# Altium PCB AirBnB-v1.0.PcbDoc (part 1 of 6)
Units mil, origin at the board's own origin, x right, y up, seen from the top; angles counter-clockwise.
Board outline 3937 x 3937 mil, 4 copper layers (Top Layer, Signal + GND, Signal + 3v3, Bottom Layer), stack 62.417 mil thick; 240 components, 168 nets, 829 pads, 395 vias.
Unrouted connection lines stored in the file: 6.
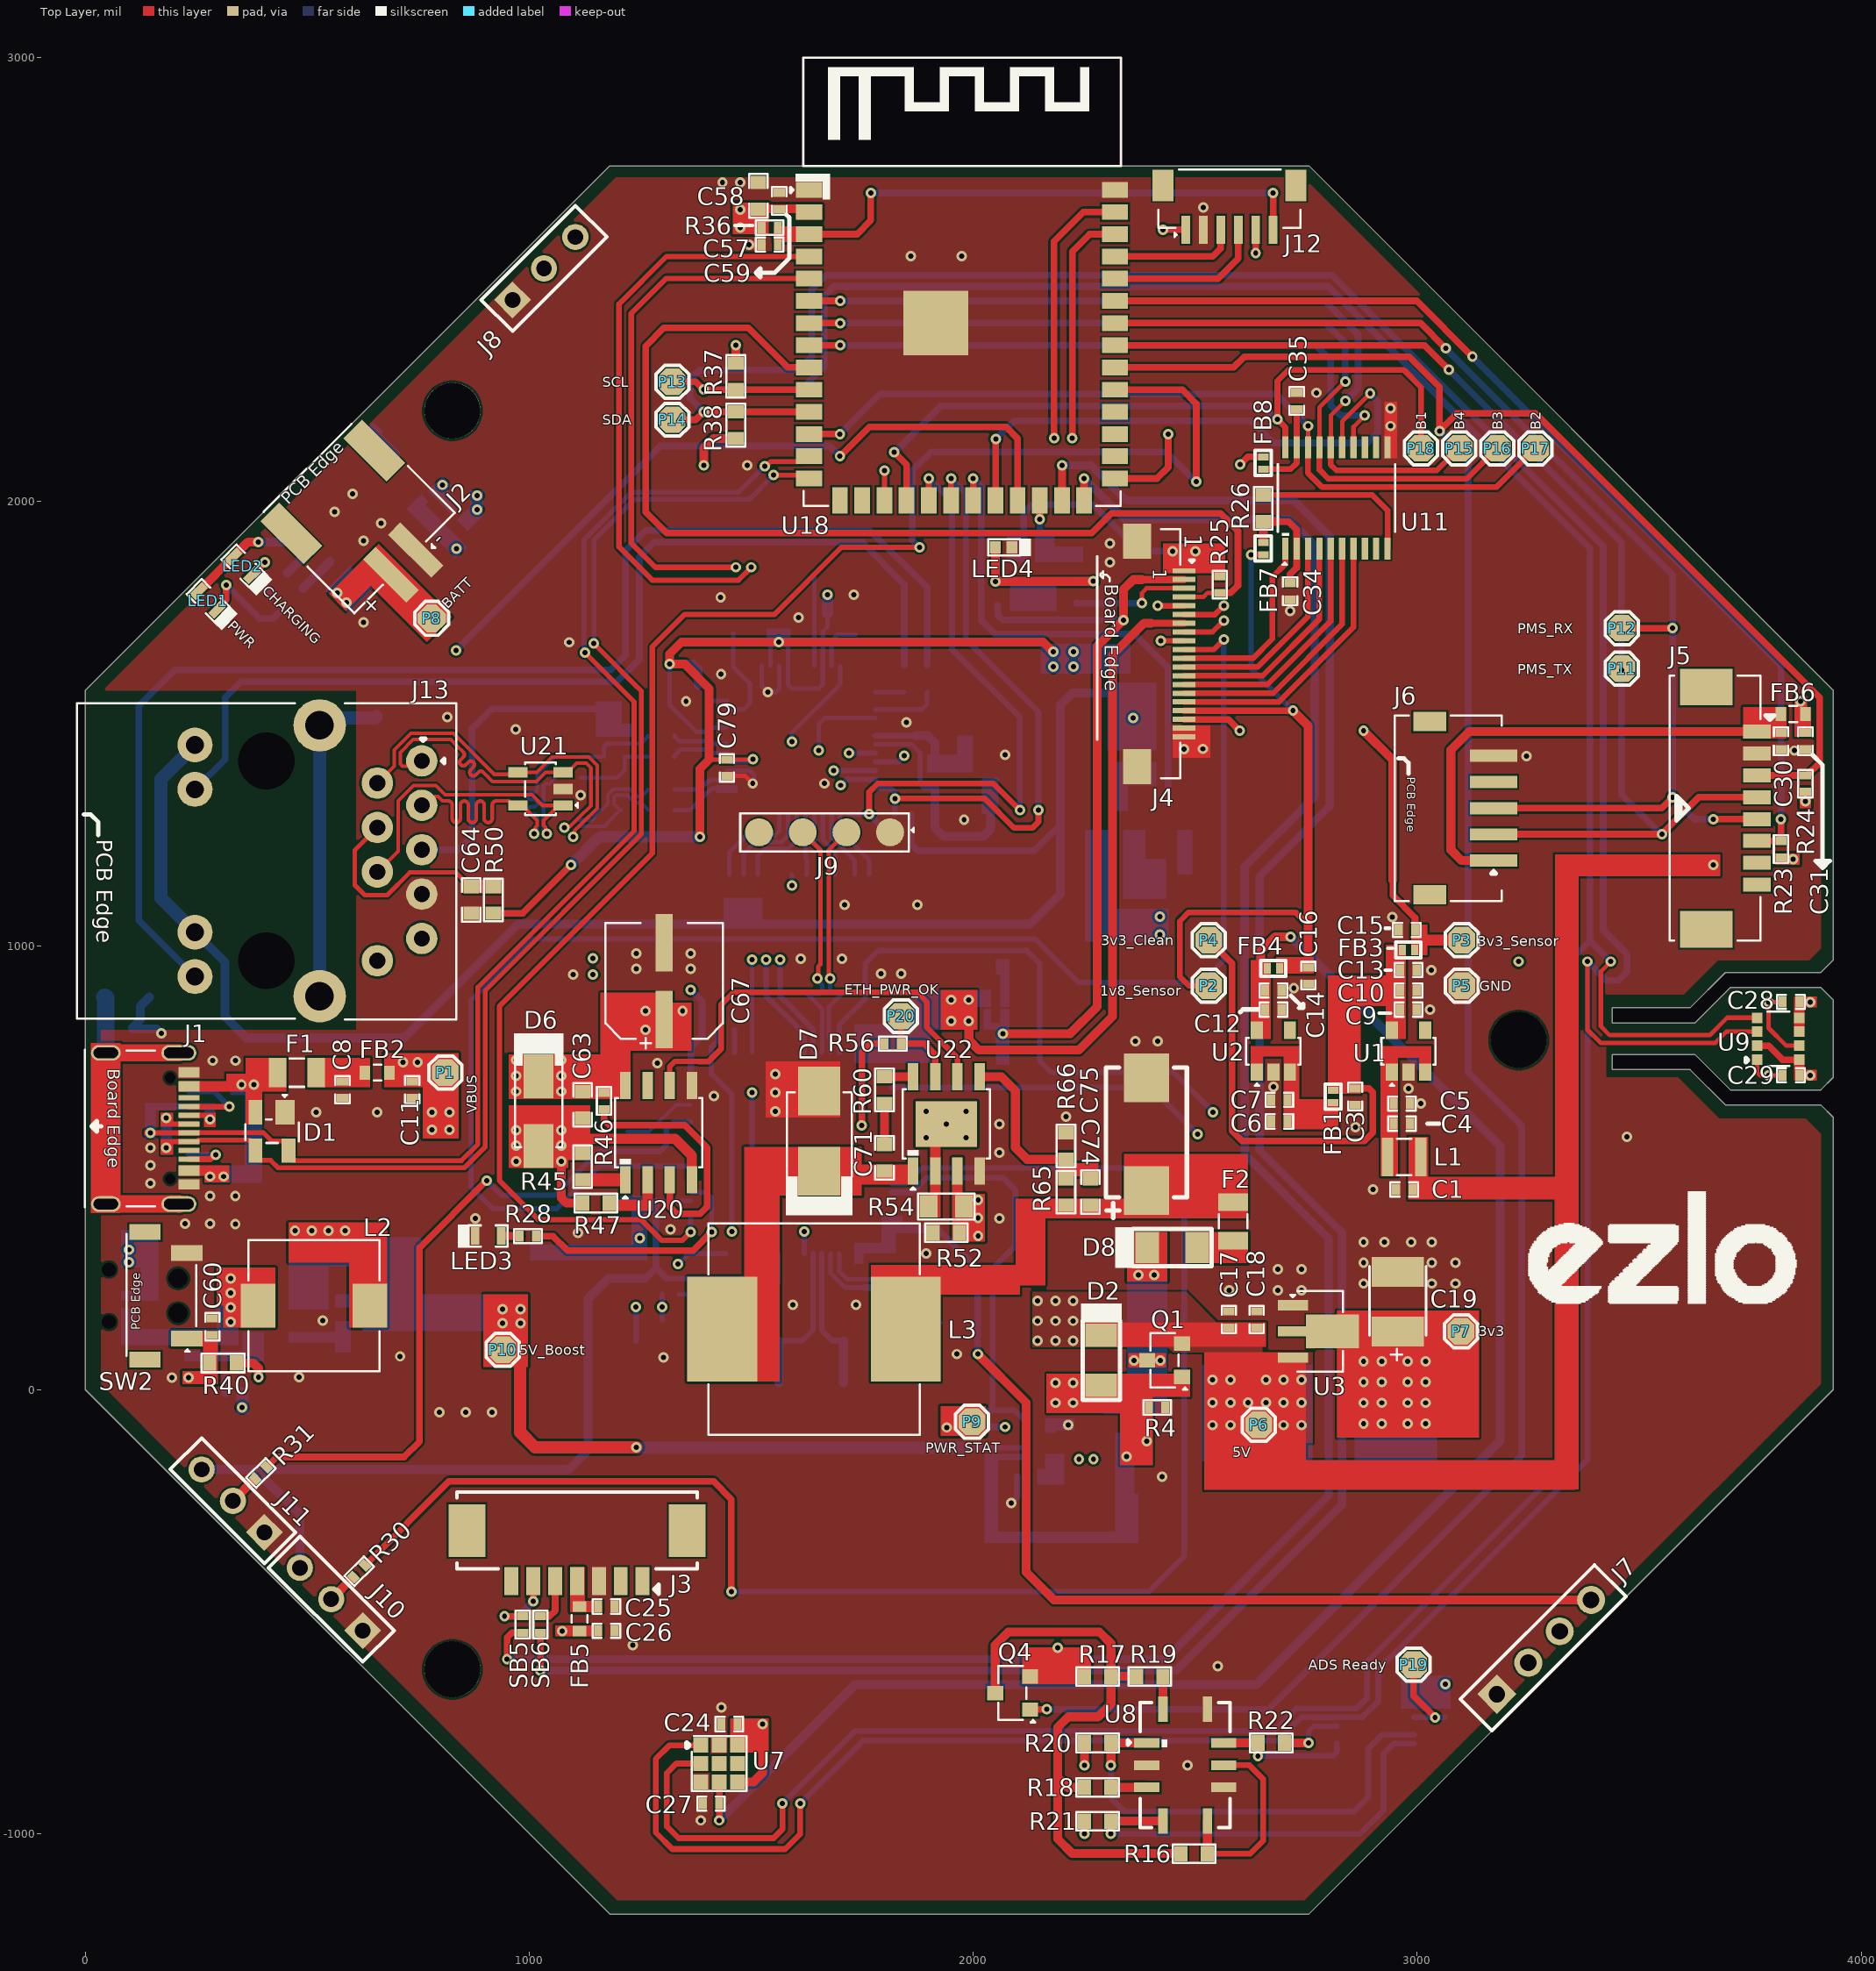
[diagram p0: Top Layer view]
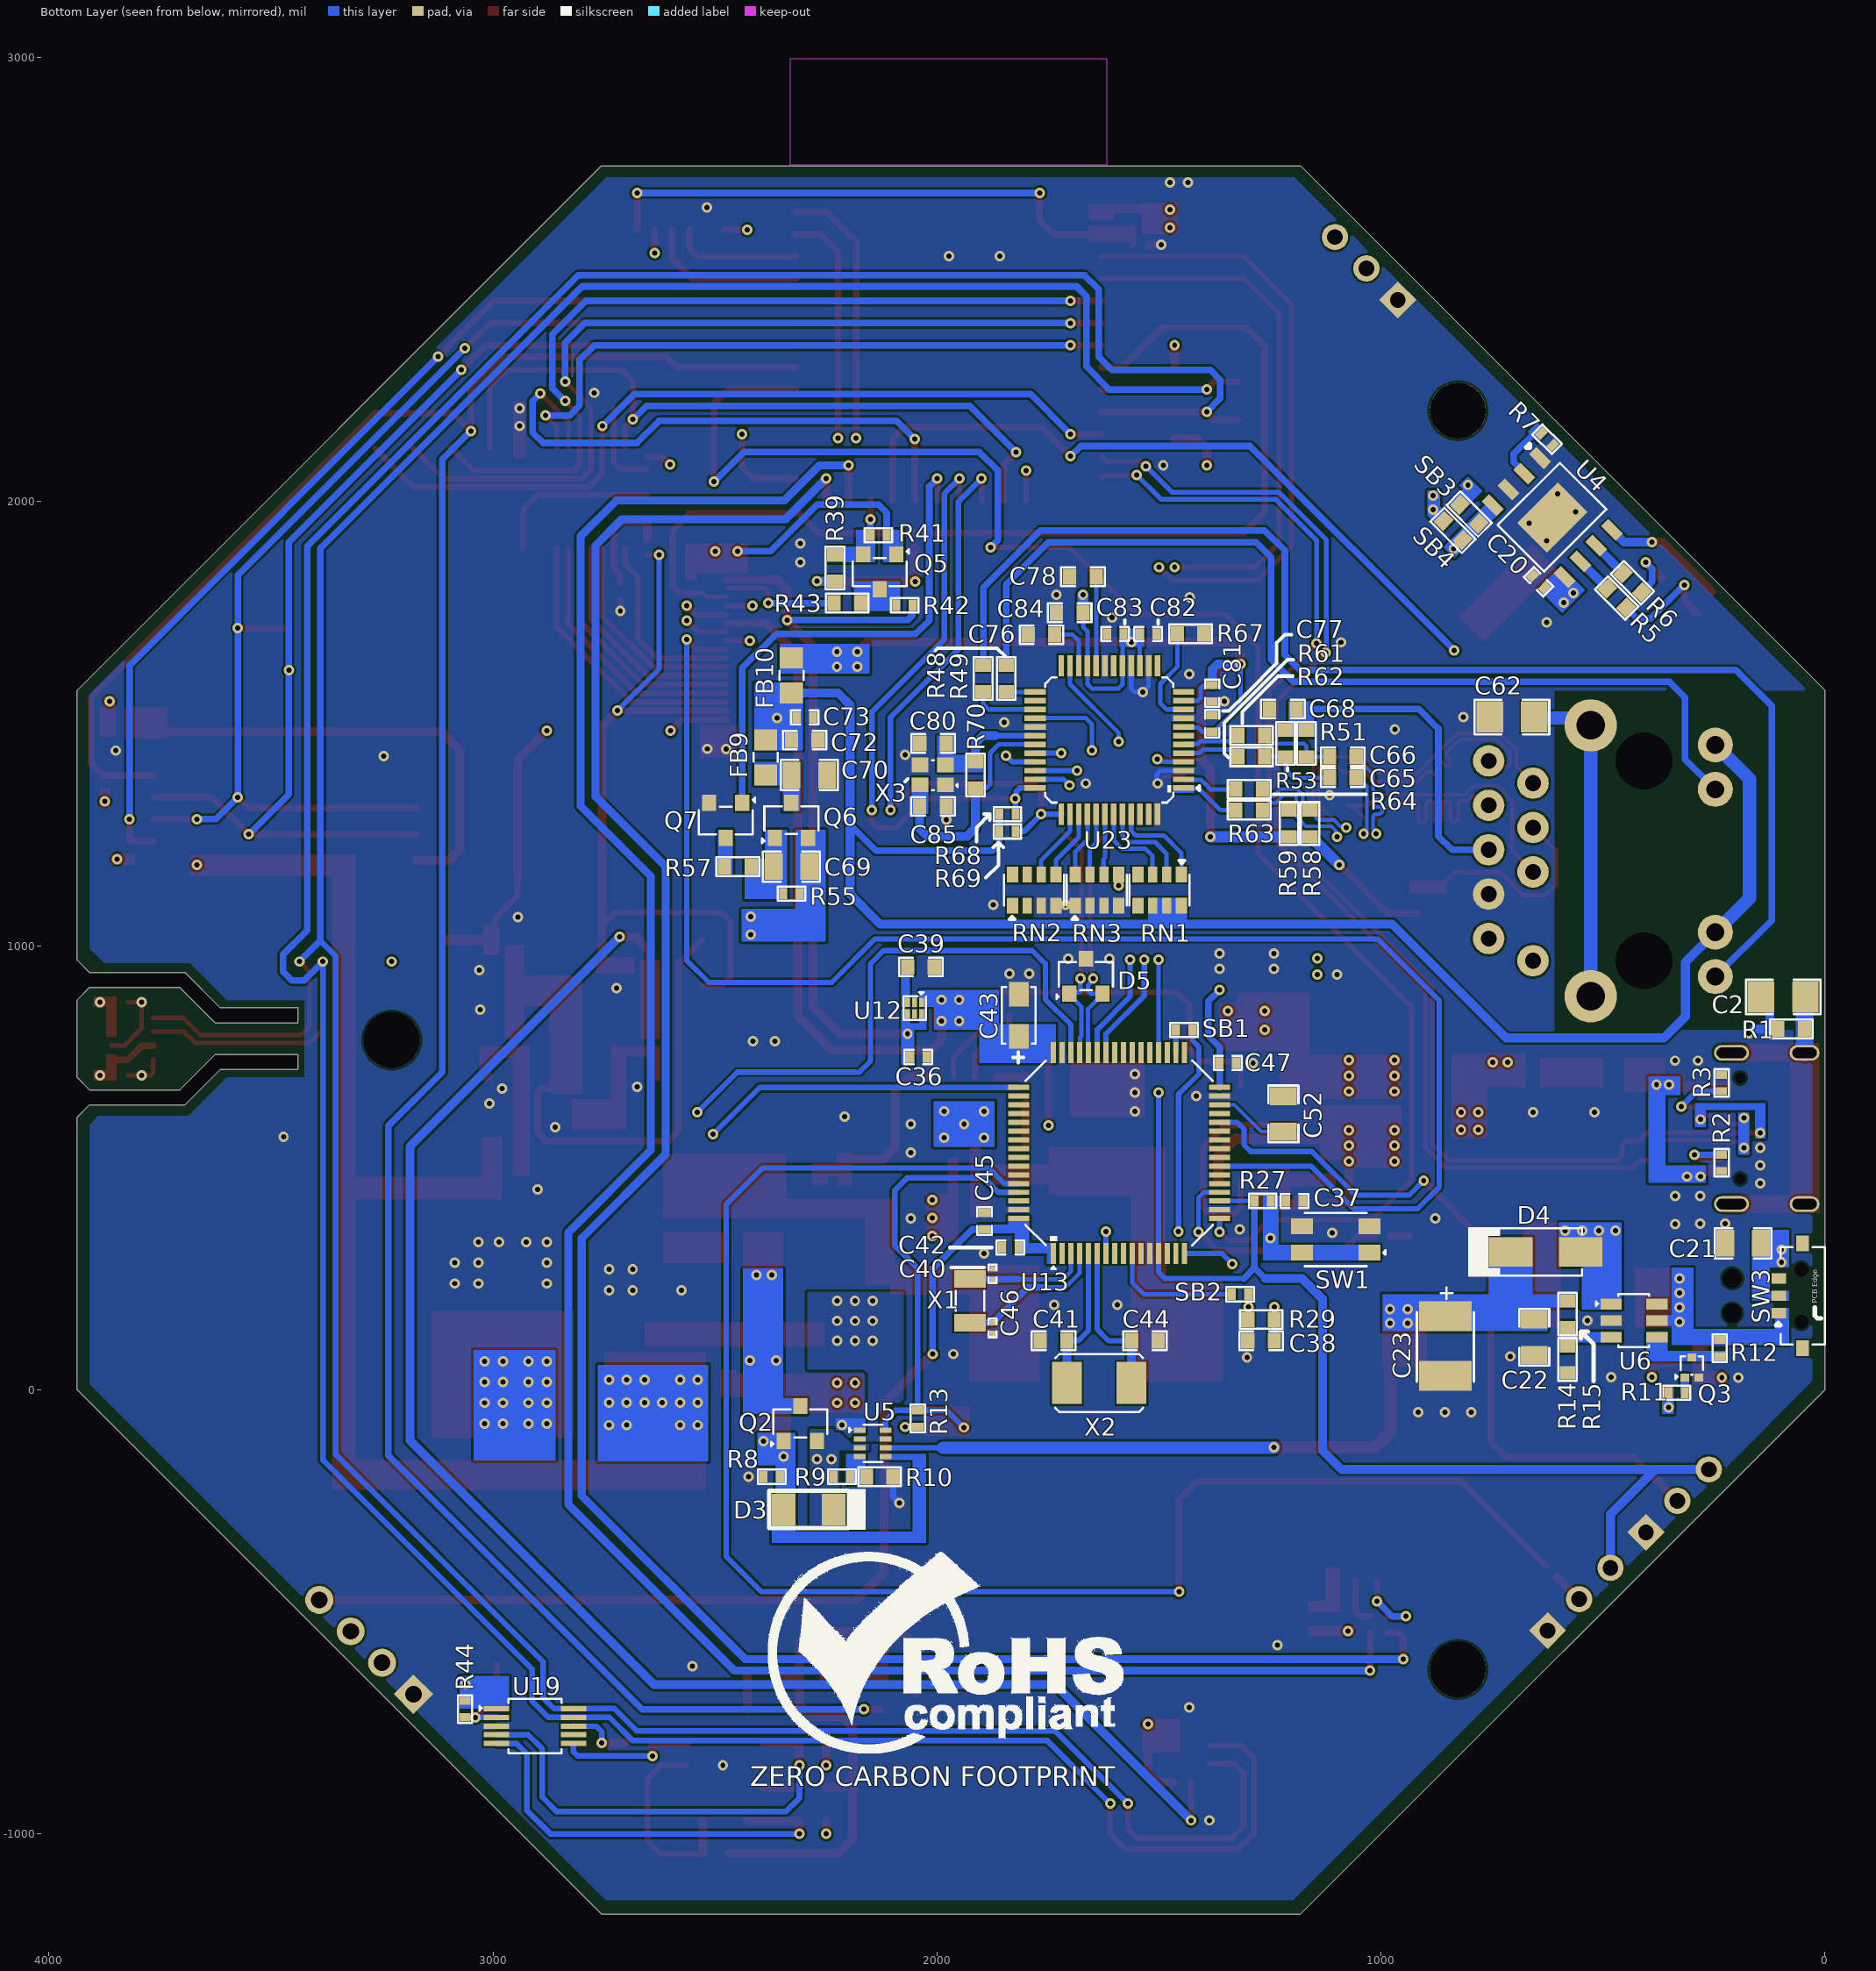
[diagram p1: Bottom Layer view, seen from below]
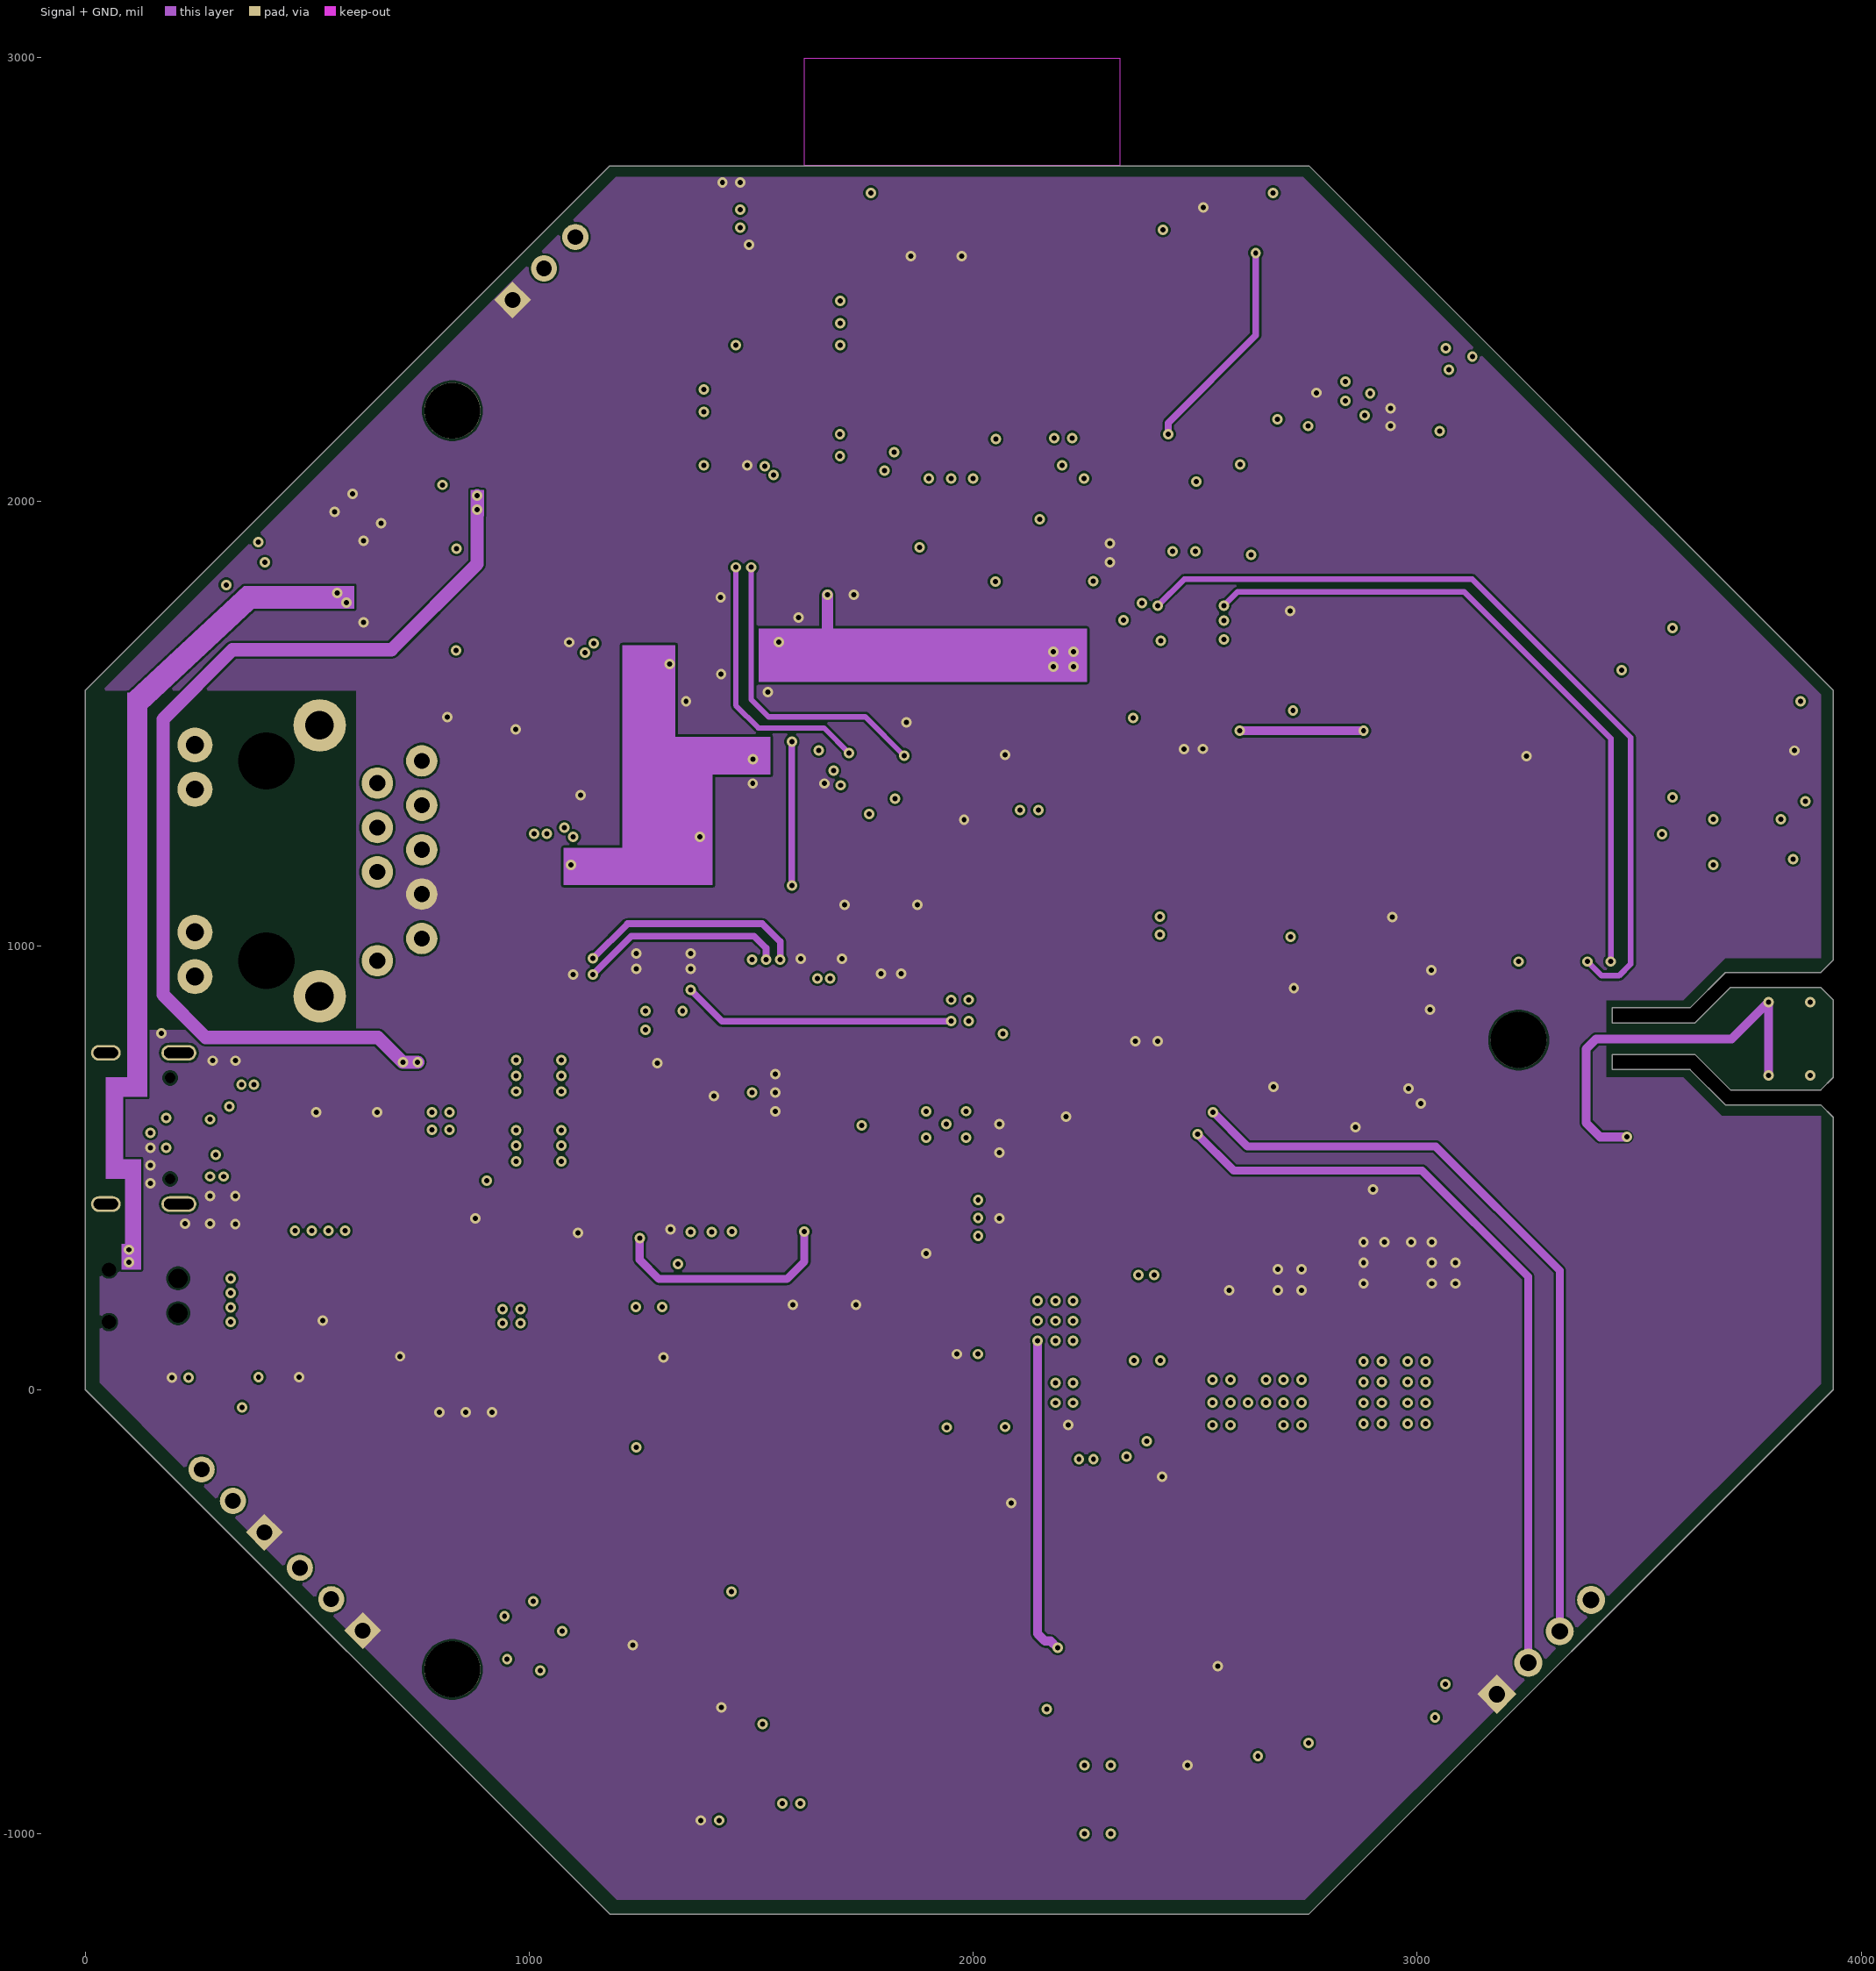
[diagram p2: Signal + GND]
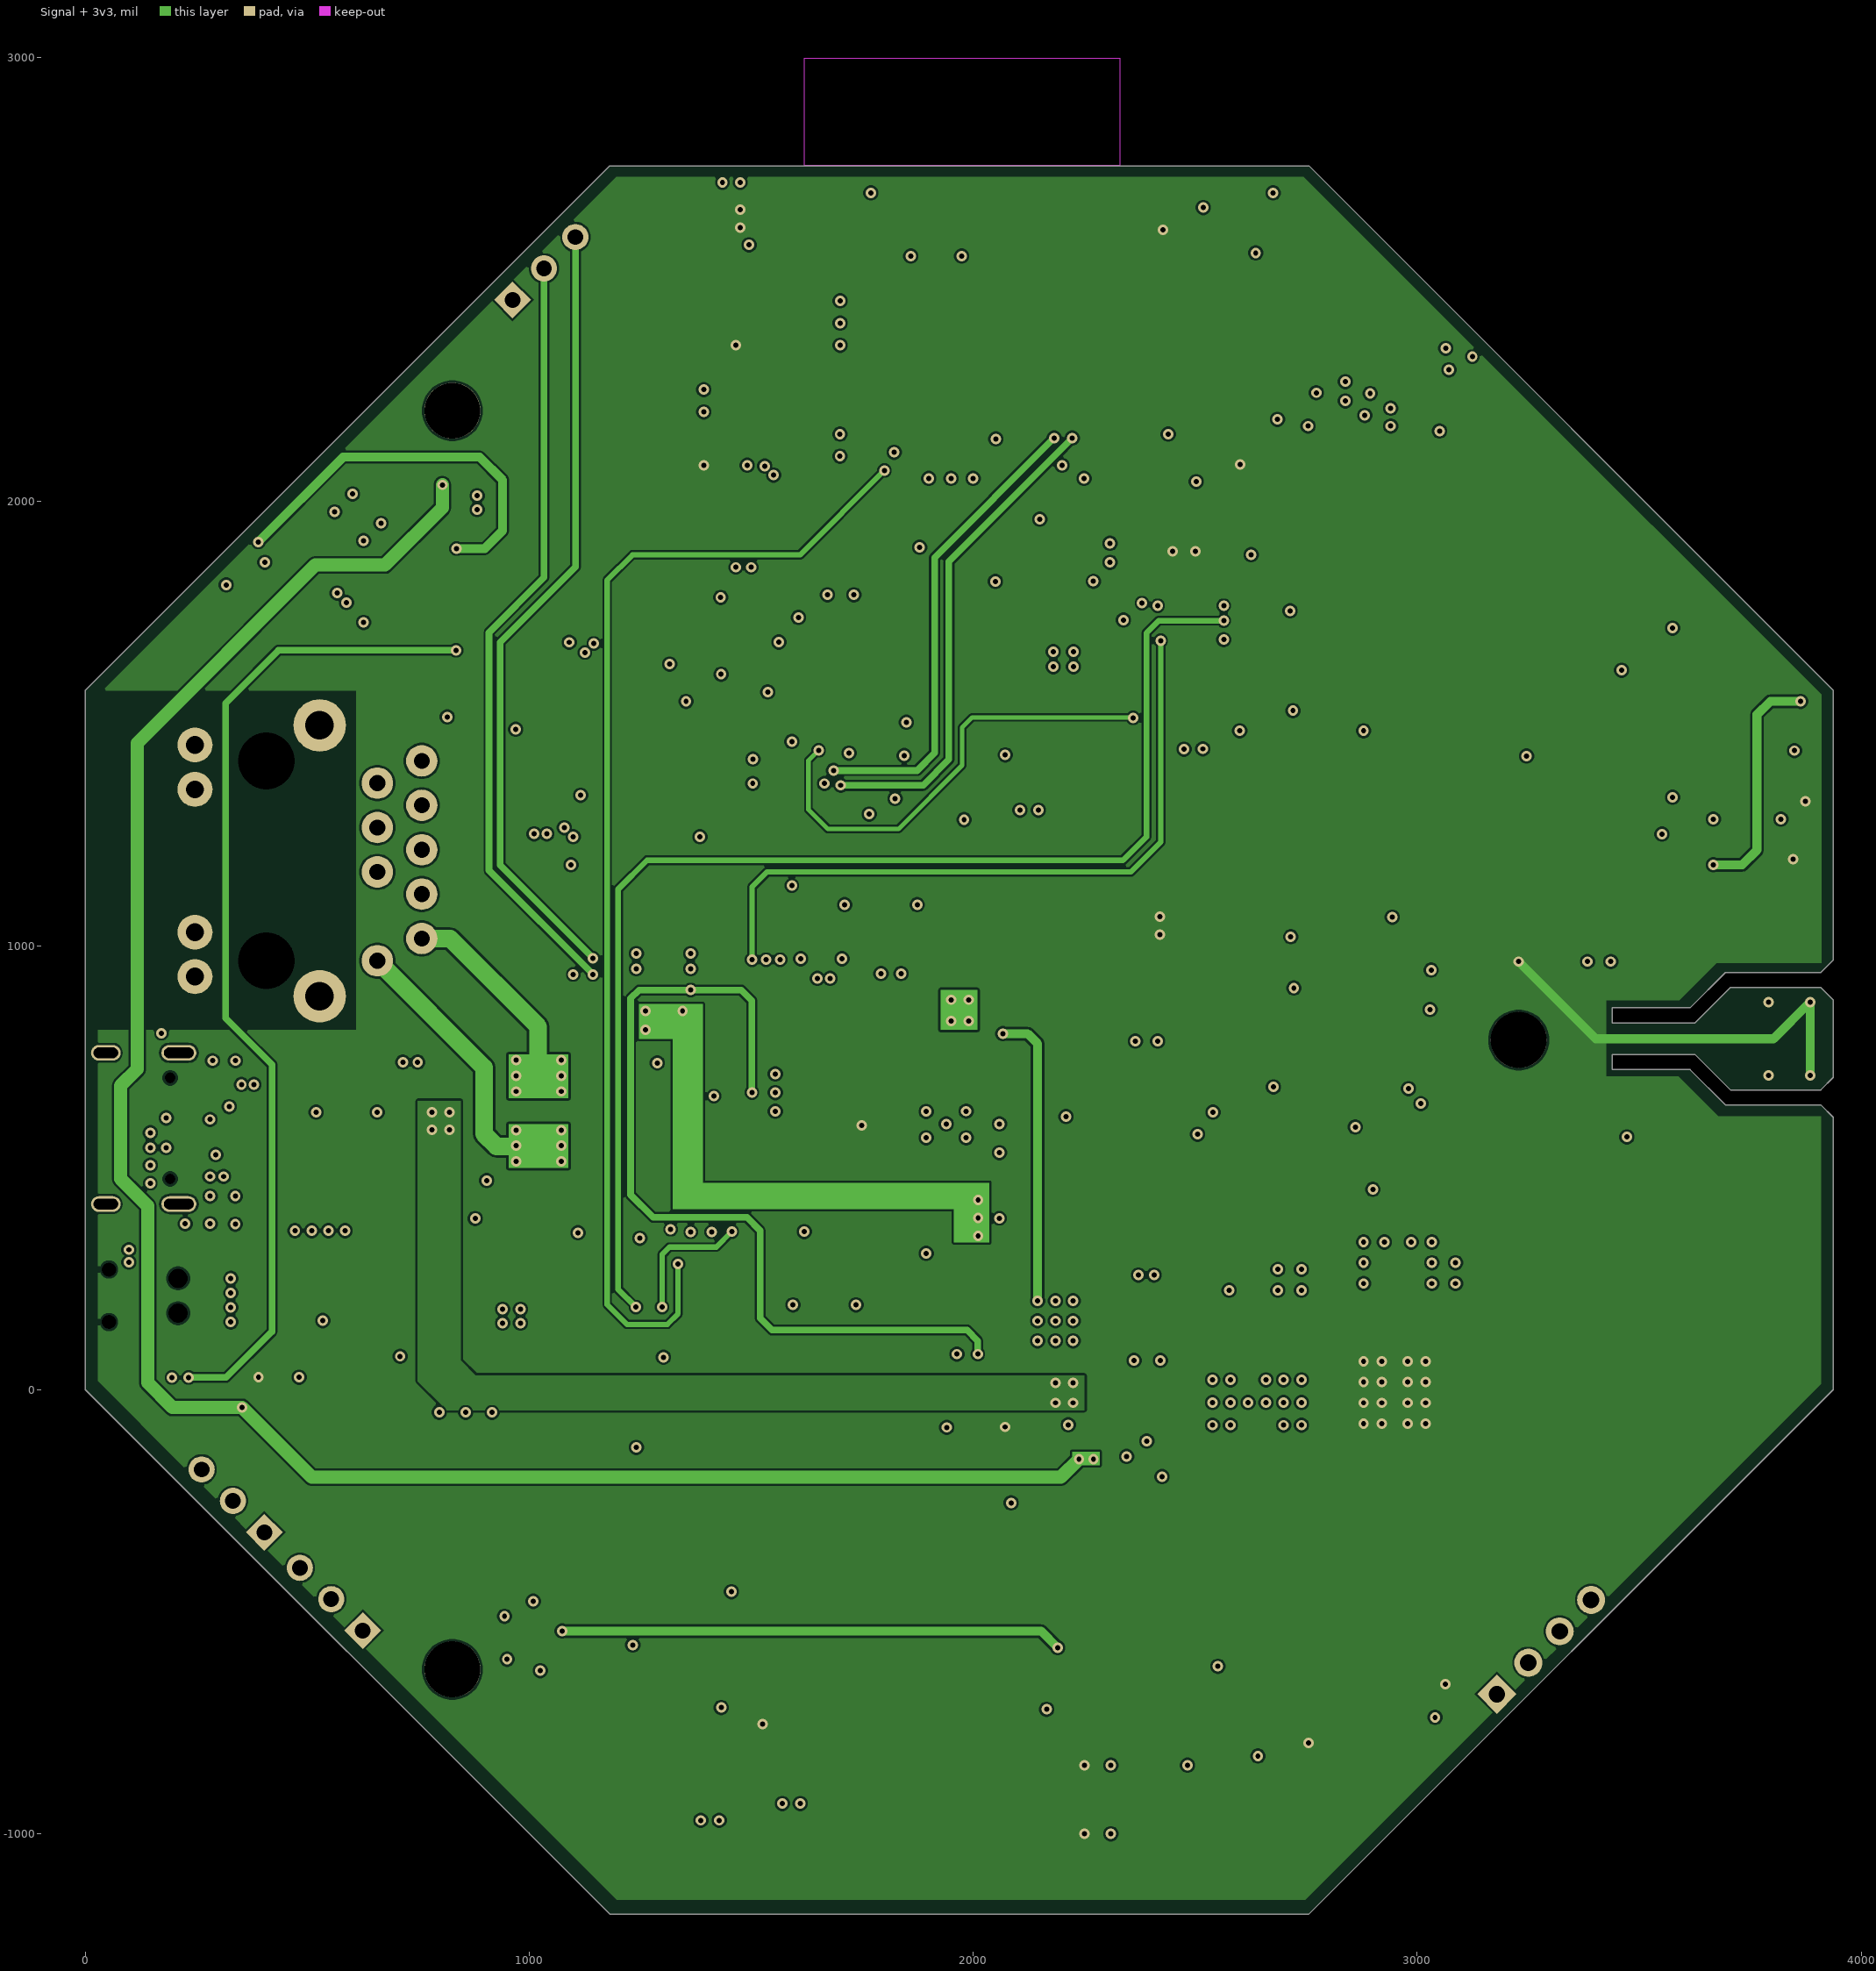
[diagram p3: Signal + 3v3]
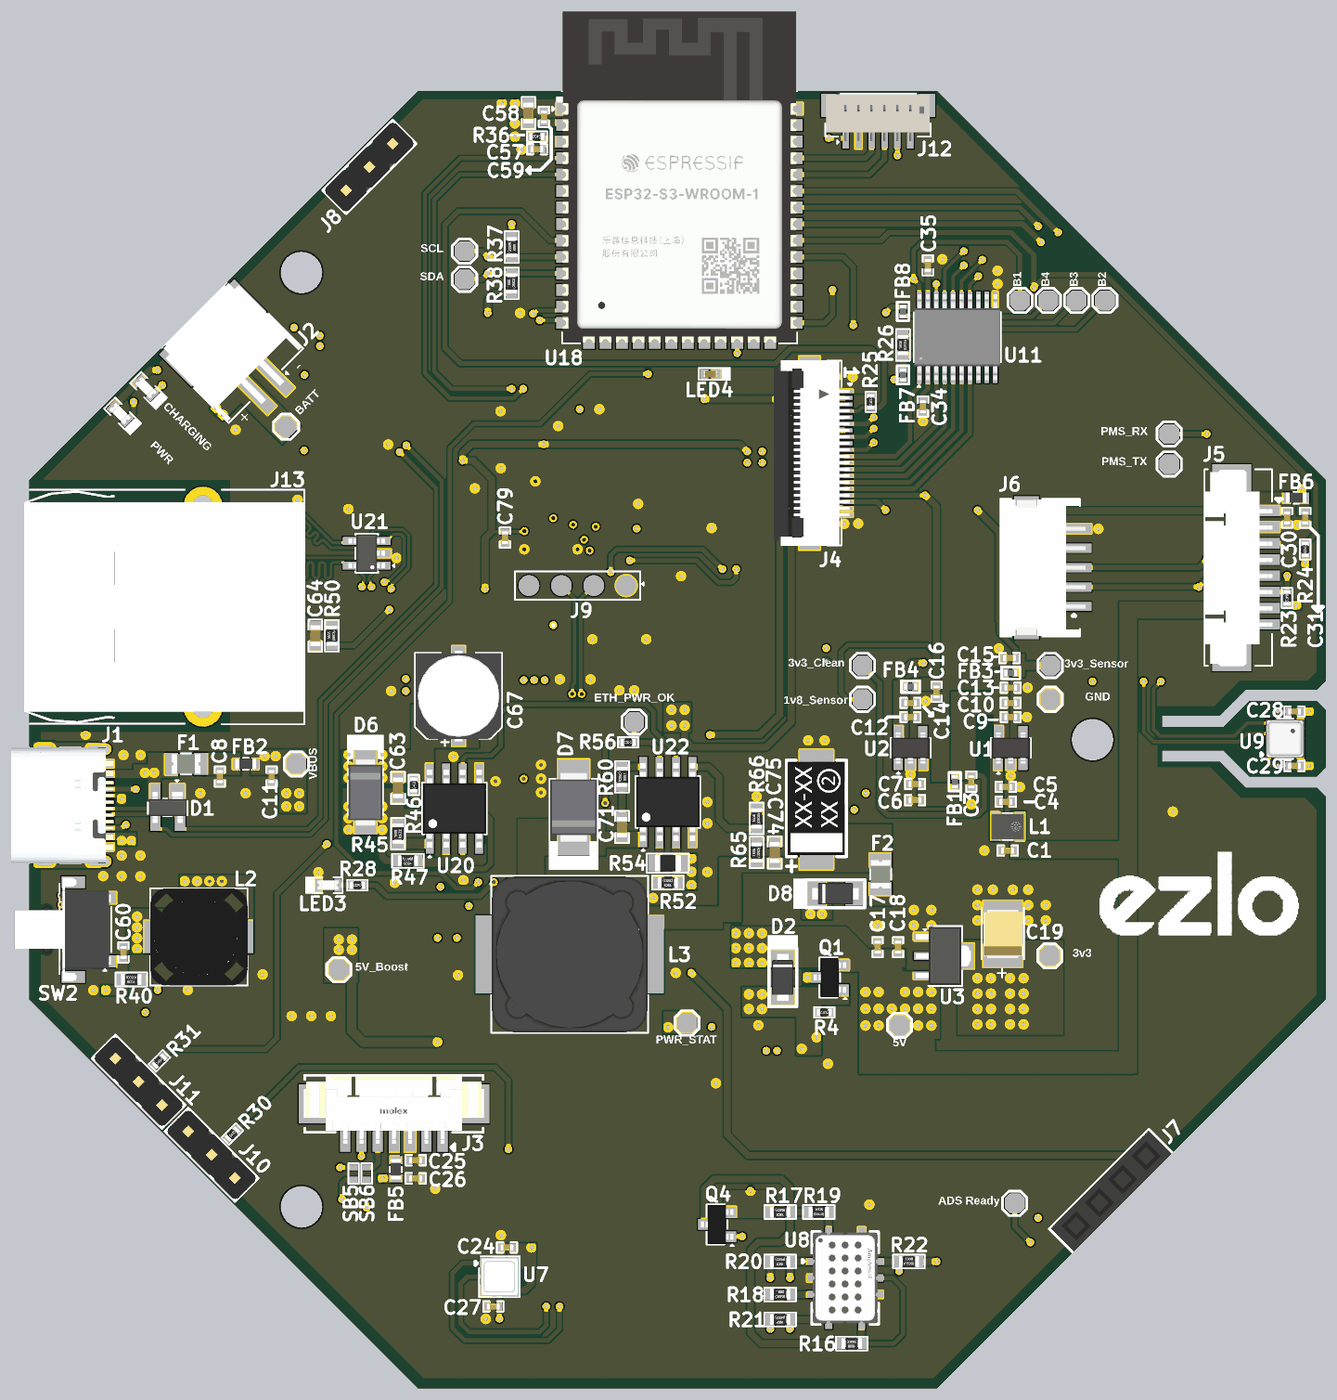
[diagram p6: 3D render of the assembled board from above, using the file's embedded part models]
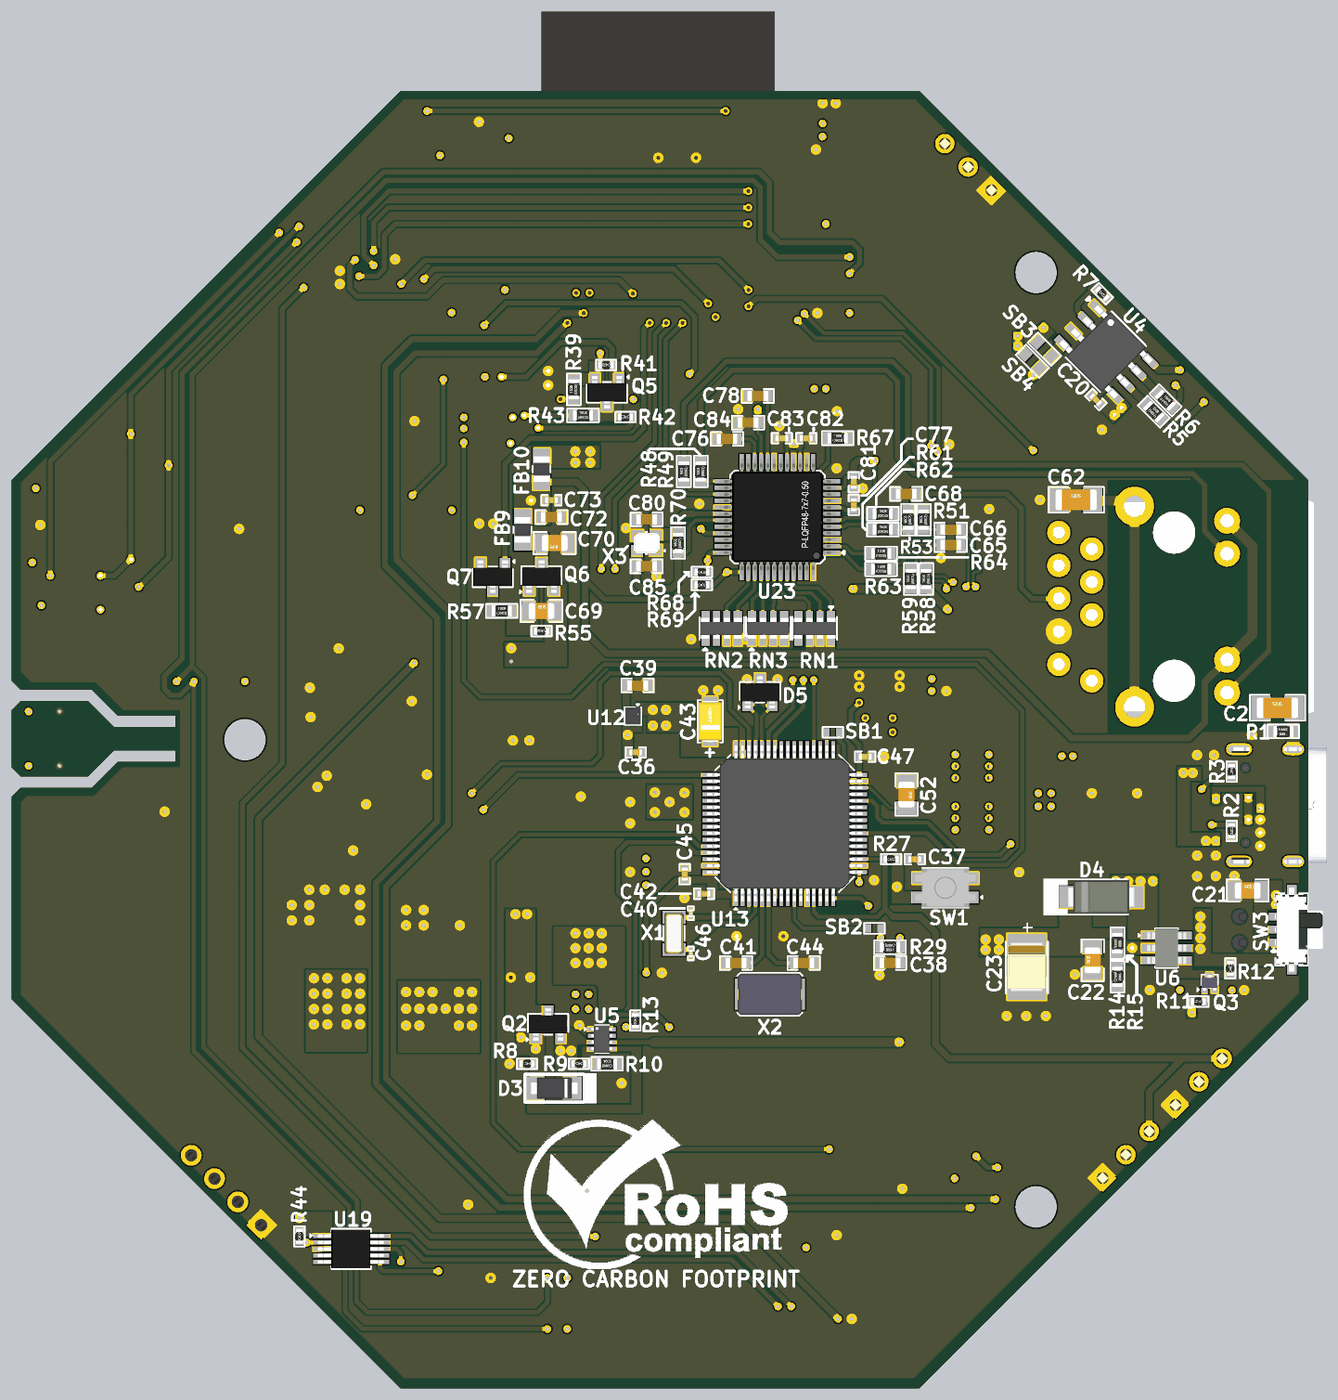
[diagram p7: 3D render of the assembled board from below, using the file's embedded part models]

## Layer stack, top to bottom
Top Solder: solder mask 0.3937, Solder Resist, Dk 3.3
Top Layer: signal copper 1.378
Dielectric 2: core 8.2677, FR-4, Dk 4.6
Signal + GND: signal copper 0.5984
Dielectric 1: prepreg 41.9291, FR-4, Dk 4.6
Signal + 3v3: signal copper 0.5984
Dielectric 3: core 8.2677, FR-4, Dk 4.6
Bottom Layer: signal copper 1.378
Bottom Solder: solder mask 0.3937, Solder Resist, Dk 3.3

## Board outline
1181.1,-1181.1 2755.9,-1181.1 3937,0 3937,613.25 3908.94,641.31 3693.87,641.31 3614.62,720.55 3439,720.55 3439,755 3625.5,755 3705.5,675 3908.94,675 3937,703.06 3937,877.44 3908.94,905.5 3705.5,905.5 3625.5,825.5 3439,825.5 3439,859.95 3614.62,859.95 3693.87,939.2 3908.94,939.2 3937,967.26 3937,1574.8 2755.9,2755.9 1181.1,2755.9 0,1574.8 0,0

## Design rules (kind name [scope] priority, off if disabled: settings)
Clearance [All] p1: gap=5 ignorepadtopadclearanceinfootprint=FALSE except(4: SMDPad-SMDPad SMDPad-Fill SMDPad-Poly SMDPad-Region)
ComponentClearance [All] p1: gap=0 collisioncheckmode=3 verticalgap=0 showdistances=FALSE
DiffPairsRouting "DiffPairsRouting-TypeC2.0 and STM USB" [(InDifferentialPairClass('USB_Lines') AND InDifferentialPairClass('STM_USB_Lines'))] p1: maxlimit=20 minlimit=5 mostfreqgap=20 toplayer_maxgap=5 toplayer_prefgap=5 toplayer_minwidth=10 toplayer_maxwidth=10 toplayer_prefwidth=10 midlayer1_mingap=20 midlayer1_minwidth=10 midlayer1_maxwidth=10 midlayer1_prefwidth=10 midlayer2_mingap=20 midlayer2_minwidth=10 midlayer2_maxwidth=10 midlayer2_prefwidth=10 bottomlayer_maxgap=5 bottomlayer_prefgap=5 bottomlayer_minwidth=10 bottomlayer_maxwidth=10 bottomlayer_prefwidth=10 impedanceprofiledriven=TRUE impedanceprofileid={138EB197-EF0B-4B95-91F8-66475E0C6942} impedanceprofilevalue=90.000000 maxuncoupledlength=500
DiffPairsRouting DiffPairsRouting-Ethercat [InDifferentialPairClass('Ethernet_Lines')] p2: maxlimit=12 minlimit=6 mostfreqgap=12 toplayer_maxgap=6 toplayer_prefgap=6 toplayer_minwidth=8 toplayer_maxwidth=8 toplayer_prefwidth=8 midlayer1_mingap=12 midlayer1_minwidth=6 midlayer1_maxwidth=6 midlayer1_prefwidth=6 midlayer2_mingap=12 midlayer2_minwidth=6 midlayer2_maxwidth=6 midlayer2_prefwidth=6 bottomlayer_maxgap=6 bottomlayer_prefgap=6 bottomlayer_minwidth=8 bottomlayer_maxwidth=8 bottomlayer_prefwidth=8 impedanceprofiledriven=TRUE impedanceprofileid={E30291CC-230C-41C6-9147-3A8EA8AB3948} impedanceprofilevalue=100.000000 maxuncoupledlength=700
HoleSize [All] p1: absolutevalues=TRUE maxlimit=150 minlimit=1 maxpercent=80.000 minpercent=20.000
HoleToHoleClearance [All] p1: gap=5 allowstackedmicrovias=TRUE
MatchedLengths "Schematic Matched Net Lengths_2" [InNetClass('STM_USB')] p1: tolerance=20 checknetsindiffpair=TRUE checkdiffpairvsdiffpair=FALSE checkxsignals=FALSE checkothers=FALSE
MatchedLengths "Schematic Matched Net Lengths_1" [InNetClass('USB')] p2: tolerance=20 checknetsindiffpair=TRUE checkdiffpairvsdiffpair=FALSE checkxsignals=FALSE checkothers=FALSE
MatchedLengths "Schematic Matched Net Lengths_3" [InNetClass('Ethernet')] p3: tolerance=20 checknetsindiffpair=TRUE checkdiffpairvsdiffpair=FALSE checkxsignals=FALSE checkothers=FALSE
MaxMinImpedance "Schematic Impedance Constraint_1" [InNetClass('STM_USB')] p1: minimum=87.00 maximum=92.00
MaxMinImpedance "Schematic Impedance Constraint" [InNetClass('USB')] p2: minimum=87.00 maximum=92.00
MaxMinImpedance "Schematic Impedance Constraint_3" [InNetClass('Ethernet')] p3: minimum=97.00 maximum=105.0
MinimumSolderMaskSliver [All] p1: minsoldermaskwidth=0
PolygonConnect [All] p1: connectstyle=Direct reliefconductorwidth=15 reliefentries=4 polygonreliefangle="45 Angle" airgapwidth=10
RoutingVias [All] p1: holewidth=11.81 width=23.62 viastyle="Through Hole" minholewidth=11.81 minwidth=23.62 maxholewidth=11.81 maxwidth=23.62
SilkToSilkClearance [All] p1: silktosilkclearance=0
SilkToSolderMaskClearance [IsPad] p1: minsilkscreentomaskgap=0 clearancetoexposedcopper=TRUE
SolderMaskExpansion [All] p1: expansion=4 istentingtop=FALSE
UnRoutedNet [All] p1: checkbadconnections=TRUE
Width [All] p1: maxlimit=50 minlimit=8 preferedwidth=15
22 further rules are at their usual default settings.

## Classes and differential pairs
differential pair class USB_Lines: USB
differential pair class STM_USB_Lines: USB_D
differential pair class Ethernet_Lines: RD TD
net class USB: USB_N USB_P
net class STM_USB: USB_D_N USB_D_P
net class Ethernet: RD_N RD_P TD_N TD_P
component class U_Sound-Detection-Sheet: C36 C37 C38 C39 C40 C41 C42 C43 C44 C45 C46 C47 C52 D5 J7 J8 J9 J10 J11 LED3 R27 R28 R29 R30 R31 SB1 SB2 SW1 U12 U13 X1 X2 z
component class U_Sensor-Sheet: C24 C25 C26 C27 C28 C29 C30 C31 FB5 FB6 J3 J4 J5 J6 P11 P12 Q4 R16 R17 R18 R19 R20 R21 R22 R23 R24 R25 SB5 SB6 U7 U8 U9
component class U_Power-Sheet: C1 C2 C3 C4 C5 C6 C7 C8 C9 C10 C11 C12 C13 C14 C15 C16 C17 C18 C19 D1 D2 F1 FB1 FB2 FB3 FB4 J1 L1 P1 P2 P3 P4 P5 P6 P7 Q1 R1 R2 R3 R4 U1 U2 U3
component class U_Level_Shifter_Sheet: C34 C35 FB7 FB8 R26 U11
component class U_Ethernet-PoE-Sheet: C62 C63 C64 C65 C66 C67 C68 C69 C70 C71 C72 C73 C74 C75 C76 C77 C78 C79 C80 C81 C82 C83 C84 C85 D6 D7 D8 F2 FB9 FB10 J13 L3 P20 Q6 Q7 R45 R46 R47 R48 R49 R50 R51 R52 R53 R54 R55 R56 R57 R58 R59 R60 R61 R62 R63 R64 R65 R66 R67 R68 R69 R70 RN1 RN2 RN3 U20 U21 U22 U23 X3
component class U_ESP32-Sheet: C57 C58 C59 C60 J12 LED4 P13 P14 P15 P16 P17 P18 P19 Q5 R36 R37 R38 R39 R40 R41 R42 R43 R44 SW2 U18 U19
component class U_Charging-Boost-Sheet: C20 C21 C22 C23 D3 D4 J2 L2 LED1 LED2 P8 P9 P10 Q2 Q3 R5 R6 R7 R8 R9 R10 R11 R12 R13 R14 R15 SB3 SB4 SW3 U4 U5 U6
differential pair USB: +USB_P -USB_N
differential pair USB_D: +USB_D_P -USB_D_N
differential pair TD: +TD_P -TD_N
differential pair RD: +RD_P -RD_N

## Components (designator, comment, footprint, x,y, rotation, side; value= is the part's Value field where it differs from the comment)
C1 "10uF" Cap-0402 2970.6,451 r0 top locked
C2 "4.7nF" Cap-1206 94.12,884 r180 bottom locked
C3 "0.1uF" Cap-0402 2860.31,659.91 r90 top locked
C4 "10uF" Cap-0402 2965.11,599 r180 top locked
C5 "0.1uF" Cap-0402 2965.11,644 r180 top locked
C6 "10uF" Cap-0402 2689.49,604 r0 top locked
C7 "0.1uF" Cap-0402 2689.49,653.1 r0 top locked
C8 "0.1uF" Cap-0402 579,675.5 r90 top locked
C9 "0.1uF" Cap-0402 2980,856 r180 top locked
C10 "10uF" Cap-0402 2980,899 r180 top locked
C11 "0.1uF" Cap-0402 736,675.5 r90 top locked
C12 "0.1uF" Cap-0402 2675.72,856 r180 top locked
C13 "0.1uF" Cap-0402 2980,945 r180 top locked
C14 "10uF" Cap-0402 2675.72,899 r180 top locked
C15 "0.1uF" Cap-0402 2976.5,1035 r0 top locked
C16 "0.1uF" Cap-0402 2754.78,932.5 r90 top locked
C17 "0.1uF" Cap-0402 2576,158 r270 top locked
C18 "10uF" Cap-0402 2638,158 r270 top locked
C19 "100uF" CASE-B 2956,197.93 r90 top
C20 "10uF" Cap-0402 645.14,1819.47 r225 bottom locked
C21 "22uF" Cap-0805 184.5,329.67 r180 bottom locked
C22 "22uF" Cap-0805 655,118.11 r90 bottom locked
C23 "33uF" CASE-B 855,98.11 r270 bottom locked
C24 "0.1uF" Cap-0402 1450.57,-753.27 r180 top locked
C25 "10uF" Cap-0402 1173.47,-488.41 r180 top
C26 "10uF" Cap-0402 1173.47,-543.53 r180 top
C27 "0.1uF" Cap-0402 1409.23,-932.27 r180 top locked
C28 "0.1uF" Cap-0402 3841.5,873 r0 top locked
C29 "0.1uF" Cap-0402 3841.5,708 r0 top locked
C30 "10uF" Cap-0402 3819,1460.5 r90 top locked
C31 "10uF" Cap-0402 3874.12,1460.5 r90 top locked
C34 "0.1uF" Cap-0402 2713.46,1797.97 r90 top locked
C35 "0.1uF" Cap-0402 2728.34,2226.5 r270 top locked
C36 "10uF" Cap-0402 2042,749 r0 bottom locked
C37 "0.1uF" Cap-0402 1195,424.73 r0 bottom locked
C38 "15pF" Cap-0603 1270,110 r180 bottom locked
C39 "10nF" Cap-0603 2036.24,952 r0 bottom locked
C40 "10pF" CAP-0201 1874.71,260.58 r270 bottom locked
C41 "20pF" Cap-0603 1737.64,110 r180 bottom locked
C42 "0.1uF" Cap-0402 1834.88,320 r0 bottom locked
C43 "10uF" Case-A 1816,843 r90 bottom locked
C44 "20pF" Cap-0603 1531.97,110 r0 bottom locked
C45 "0.1uF" Cap-0402 1893.22,379.46 r270 bottom locked
C46 "10pF" CAP-0201 1874.71,138.98 r90 bottom locked
C47 "0.1uF" Cap-0402 1345.12,735.76 r0 bottom locked
C52 "2.2uF" Cap-0805 1220,620.95 r270 bottom locked
C57 "1uF" Cap-0402 1541.5,2579 r0 top locked
C58 "22uF" Cap-0603 1516,2688.5 r270 top locked
C59 "0.1uF" Cap-0402 1563,2677 r270 top locked
C60 "0.1uF" Cap-0402 286.38,141.81 r270 top locked
C62 "1000pF" Cap-1206 705,1515 r180 bottom locked
C63 "0.1uF" Cap-0603 1120,641.39 r90 top locked
C64 "22nF" Cap-0603 869,1103 r270 top locked
C65 "6.8nF" Cap-0603 1086,1378 r0 bottom locked
C66 "6.8nF" Cap-0603 1086,1425 r0 bottom locked
C67 "15uF" VMMC0571J150MV 1303.62,920 r90 top locked
C68 "10nF" Cap-0603 1221.04,1533 r180 bottom locked
C69 "22uF" Cap-0805 2328,1178 r180 bottom locked
C70 "22uF" Cap-0805 2288,1384 r0 bottom locked
C71 "0.1uF" Cap-0603 1800,522.14 r90 top locked
C72 "10uF" Cap-0603 2298,1462.74 r0 bottom locked
C73 "0.1uF" Cap-0402 2298,1514 r0 bottom locked
C74 "12pF" Cap-0603 2263.5,445.13 r270 top locked
C75 "330uF" Case-E 2390,448.3 r90 top locked
C76 "10nF" Cap-0603 1765,1700 r180 bottom locked
C77 "0.1uF" Cap-0402 1380,1500 r270 bottom locked
C78 "4.7uF" Cap-0603 1671.39,1830.55 r180 bottom locked
C79 "0.1uF" Cap-0402 1444.68,1400.4 r90 top locked
C80 "12pF" Cap-0603 2009,1455.5 r180 bottom locked
C81 "0.1uF" Cap-0402 1380,1568.5 r90 bottom locked
C82 "0.1uF" Cap-0402 1524.5,1702 r0 bottom locked
C83 "0.1uF" Cap-0402 1598.5,1702 r180 bottom locked
C84 "10uF" Cap-0603 1701.18,1749.51 r180 bottom locked
C85 "12pF" Cap-0603 2009.2,1313.5 r0 bottom locked
D1 "SP0503BAHTG" SOT-143-4_ 450,624.93 r270 top locked
D2 "DNP" SOD-123FL 2288,66 r270 top locked
D3 "PMEG4030ER" SOD-123FL 2289.11,-270 r0 bottom locked
D4 "SS34" SMA 629,310 r180 bottom locked
D5 "ESD5302F-3/TR" Sot-23 1664.8,931 r180 bottom locked
D6 "SMAJ58A" SMA 1021,627.09 r270 top locked
D7 "SS510B" SMB_ 1652.99,582.21 r270 top locked
D8 "PMEG4030ER" SOD-123FL 2447.93,320 r0 top locked
F1 "BSMD0805L-200" Fuse-0805 476.38,714 r0 top locked
F2 "BSMD0805L-200" Fuse-0805 2585,379 r270 top locked
FB1 "BLM15PD121SN1D" IND-0402 2810.62,659.91 r270 top locked
FB2 "BLM18SG121TN1D" "IND-0603 (1608 Metric)" 657.48,714 r0 top locked
FB3 "BLM15PD121SN1D" IND-0402 2980,990 r0 top locked
FB4 "BLM15PD121SN1D" IND-0402 2675.72,948.44 r0 top locked
FB5 "BLM18SG121TN1D" "IND-0603 (1608 Metric)" 1113,-515.97 r270 top
FB6 "BLM18SG121TN1D" "IND-0603 (1608 Metric)" 3846.56,1521.5 r0 top locked
FB7 "BLM15PD121SN1D" IND-0402 2653,1894.09 r90 top locked
FB8 "BLM15PD121SN1D" IND-0402 2653,2086.78 r270 top locked
FB9 "CBM201209U601T" Ind-0805 2386,1424 r90 bottom locked
FB10 "CBM201209U601T" Ind-0805 2328,1608.37 r90 bottom locked
J1 "TYPE-C-31-M-12" TYPE-C-31-M-12_ 233.13,714.2 r270 top locked
J2 "WAFER-PH2.0-2PWB" WAFER-PH2.0-2PWB 636.9,1942.18 r225 top locked
J3 "53261-0771" 53261-0771 1107.47,-374.41 r180 top locked
J4 "AFC01-S20FCC-00" AFC01-S20FCC-00 2422,1657 r270 top locked
J5 "0532610871" 53261-0871 3708,1309.5 r270 top locked
J6 "S5B-ZR-SM4A-TF(LF)(SN)" S5B-ZR-SM4A-TF(LF)(SN) 3100,1309.5 r270 top locked
J7 "C2718488" "HDR1X4 Female" 3285.36,-579.64 r45 top locked
J8 "61300311121" HDR1X3_ 962.29,2454.29 r45 top locked
J9 "POGO Connector 4 Pin" "Pogo 4 Pin" 1665,1255 r180 top locked
J10 "61300311121" HDR1X3_ 624.59,-542.59 r135 top locked
J11 "61300311121" HDR1X3_ 403.17,-321.17 r135 top locked
J12 "Voltlink Target" "Voltlink Target" 2577,2662 r0 top locked
J13 "HR861153C" HR861153C 502.32,1190.95 r90 top locked
L1 "10uH" "IND-1008 (2520 Metric)" 2970.6,524 r180 top locked
L2 "22uH" SMRH74-220MT 515,189 r0 top locked
L3 "33uH" CYH127-33UH 1641,136 r0 top locked
LED1 "Emerald" LED-0603 276.3,1777.26 r315 top locked
LED2 "RED" LED-0603 354.42,1855.14 r315 top locked
LED3 "RED" LED-0603 907.46,345.87 r180 top locked
LED4 "XZVG68W-2" LED-0402 2068.36,1897 r0 top locked
P1 "TEST POINT" Test-point 811,714 r0 top locked
P2 "TEST POINT" Test-point 2530,910 r90 top locked
P3 "TEST POINT" Test-point 3100,1012.2 r0 top locked
P4 "TEST POINT" Test-point 2530,1012.2 r90 top locked
P5 "TEST POINT" Test-point 3100,910 r90 top locked
P6 "TEST POINT" Test-point 2643,-79 r0 top locked
P7 "TEST POINT" Test-point 3098.53,131.5 r0 top locked
P8 "TEST POINT" Test-point 780,1737 r45 top locked
P9 "TEST POINT" Test-point 1997,-72 r0 top locked
P10 "TEST POINT" Test-point 940,90 r0 top locked
P11 "TEST POINT" Test-point 3461,1623.48 r0 top locked
P12 "TEST POINT" Test-point 3461,1715 r0 top locked
P13 "TEST POINT" Test-point 1322,2269.72 r0 top locked
P14 "TEST POINT" Test-point 1322,2184.28 r0 top locked
P15 "TEST POINT" Test-point 3094,2120 r0 top locked
P16 "TEST POINT" Test-point 3180,2120 r0 top locked
P17 "TEST POINT" Test-point 3266,2120 r0 top locked
P18 "TEST POINT" Test-point 3008,2120 r0 top locked
P19 "TEST POINT" Test-point 2992,-619 r0 top locked
P20 "TEST POINT" Test-point 1837.06,841 r0 top locked
Q1 "DNP" SOT-23 2431,66 r90 top locked
Q2 "SI2323DS" SOT-23 2308.01,-76.31 r180 bottom locked
Q3 "MMBT3904M" SOT-723 300,50 r180 bottom locked
Q4 "WPM2015-3/TR" Sot-23 2088.61,-683.23 r90 top locked
Q5 "Si2302CDS" Sot-23 2129.16,1841.63 r0 bottom locked
Q6 "WPM2015-3/TR" Sot-23 2328,1282 r180 bottom locked
Q7 "LMUN2211LT1G" SOT-23 2476,1282 r0 bottom locked
R1 "1M" Res-0603 76.12,812.5 r180 bottom locked
R2 "5.1K" Res-0402 233,510.71 r90 bottom locked
R3 "5.1K" Res-0402 233,690.5 r270 bottom locked
R4 "10K" Res-0402 2414,-40 r0 top locked
R5 "1K" Res-0603 469.18,1782.7 r45 bottom locked
R6 "1K" Res-0603 433.83,1817.12 r45 bottom locked
R7 "1.2K" Res-0402 625.95,2140.39 r225 bottom locked
R8 "10K" Res-0402 2372.36,-196 r0 bottom locked
R9 "3.3K" Res-0402 2214.31,-196 r0 bottom locked
R10 "1K" Res-0603 2129,-196 r0 bottom locked
R11 "10K" Res-0402 334.25,-7 r0 bottom locked
R12 "10K" Res-0402 237.18,93.48 r90 bottom locked
R13 "10K" Res-0402 2043.39,-64.93 r270 bottom locked
R14 "8.2K" Res-0603 580,68 r90 bottom locked value=8.2kR
R15 "62K" Res-0603 580,170 r90 bottom locked
R16 "820R" Res-0603 2497.36,-1044.83 r0 top locked
R17 "DNP" Res-0603 2279.98,-645.83 r0 top locked
R18 "27R" Res-0603 2279.98,-895.83 r180 top locked
R19 "130R" Res-0603 2397.36,-645.83 r180 top locked
R20 "15K" Res-0603 2279.98,-795.83 r0 top locked value=15kR
R21 "1M" Res-0603 2279.98,-971.81 r0 top locked
R22 "1M" Res-0603 2670.98,-795.83 r180 top locked
R23 "10K" Res-0402 3819,1217.18 r270 top locked
R24 "10K" Res-0402 3874.12,1364.82 r270 top locked
R25 "10K" Res-0402 2555,1813 r90 top locked
R26 "0R" Res-0603 2653,1985 r270 top locked
R27 "10K" Res-0402 1266.5,425 r180 bottom locked
R28 "1.2K" Res-0402 996.69,345.87 r180 top locked
R29 "100R" Res-0603 1270,158 r180 bottom locked
R30 "10K" Res-0402 616.79,-408.97 r45 top locked
R31 "10K" Res-0402 395.37,-187.54 r45 top locked
R36 "10K" Res-0402 1541.5,2617 r180 top locked
R37 "4.7K" Res-0603 1465,2282 r90 top locked
R38 "4.7K" Res-0603 1465,2172 r270 top locked
R39 "1K" Res-0603 2229.94,1850.37 r270 bottom locked
R40 "10K" Res-0603 310,60 r0 top locked
R41 "10K" Res-0402 2131.84,1924 r0 bottom locked
R42 "10K" Res-0402 2073.26,1766.5 r0 bottom locked
R43 "1K" Res-0603 2202,1771.46 r0 bottom locked
R44 "10K" Res-0402 3063,-719.44 r90 bottom locked
R45 "180K" Res-0603 1120,502.4 r270 top locked value=180kR
R46 "24.9K" Res-0402 1168,650.07 r90 top locked
R47 "4.42K" Res-0603 1150,420 r0 top locked value=4.42kR
R48 "330R" Res-0603 1844.33,1601.27 r270 bottom locked
R49 "330R" Res-0603 1895.99,1601.27 r270 bottom locked
R50 "10R" Res-0603 919,1103 r270 top locked
R51 "49.9R" Res-0603 1168,1455 r270 bottom locked
R52 "4.7K" Res-0603 1939.08,353.56 r0 top locked
R53 "49.9R" Res-0603 1215,1455 r270 bottom locked
R54 "30mR" RES-0805 1939.08,412.56 r0 top locked
R55 "10K" Res-0402 2328,1117 r0 bottom locked
R56 "10K" Res-0402 1818.56,779.21 r180 top locked
R57 "1K" Res-0603 2448.74,1178 r0 bottom locked
R58 "49.9R" Res-0603 1160,1275 r270 bottom locked
R59 "49.9R" Res-0603 1207,1275 r270 bottom locked
R60 "4.7R" Res-0603 1800,674.74 r90 top locked
R61 "33R" Res-0603 1292,1425 r0 bottom locked
R62 "33R" Res-0603 1292,1473 r0 bottom locked
R63 "33R" Res-0603 1297,1305 r0 bottom locked
R64 "33R" Res-0603 1297,1352 r0 bottom locked
R65 "301R" Res-0603 2208.58,445.13 r270 top locked
R66 "57.6K" Res-0603 2208.58,548.52 r270 top locked
R67 "12.4K" Res-0603 1429,1702 r0 bottom locked
R68 "10K" Res-0402 1841.4,1296 r180 bottom locked
R69 "10K" Res-0402 1841.4,1257 r180 bottom locked
R70 "1M" Res-0603 1913.49,1384.5 r270 bottom locked
RN1 "10K" YC164-FR-0710KL 1450,1160 r270 bottom locked value=10kR
RN2 "10K" YC164-FR-0710KL 1830,1090.32 r90 bottom locked value=10kR
RN3 "10K" YC164-FR-0710KL 1688.82,1090.32 r90 bottom locked value=10kR
SB1 "Solder Bridge 0402" "Solder Bridge 0402" 1443.55,810 r180 bottom locked
SB2 "Solder Bridge 0402" "Solder Bridge 0402" 1317.5,214.87 r180 bottom locked
SB3 "Solder Bridge 0603" "Solder Bridge" 801.32,1971.96 r225 bottom locked
SB4 "Solder Bridge 0603" "Solder Bridge" 837.8,1935.16 r225 bottom locked
SB5 "Solder Bridge 0402" "Solder Bridge 0402" 985,-528.96 r90 top
SB6 "Solder Bridge 0402" "Solder Bridge 0402" 1024.79,-528.96 r90 top
SW1 "TS-1185EC-C-D-B" TS-1185EC-C-D-B_ 1102,338 r0 bottom locked
SW2 "TP12422673" TP12422673 181.5,211.3 r90 top locked
SW3 "MK-11C04-G013" MK-11C04-G013 77,211.3 r90 bottom locked
U1 "XC6228D332VR-G" SOT-25-5 2980,762.24 r90 top locked
U2 "XC6228D182VR-G" SOT-25-5 2675.72,762.24 r90 top locked
U3 "LD1117AG-33-AB3-A-R" SOT-89-3 2764.41,131 r270 top locked
U4 "TP4056-42-ESOP8" ESOP-8 614.1,1963.98 r225 bottom locked
U5 "TPS2116DRLR" SOT-583 2145.13,-120.84 r180 bottom locked
U6 "MT3608" SOT-23-6 430,155.51 r180 bottom locked
U7 "ENS160-BGLT" ENS160-BGLT 1427.73,-842 r0 top locked
U8 "MICS-6814" MICS-6814 2390.75,-795.83 r0 top locked
U9 "BME680" BME680 3812.76,790.25 r180 top locked
U11 "TXS0108EPWR" TSSOP-20 2817.9,2008.26 r90 top locked
U12 "LDK120PU33R" "6-DFN (1.2x1.3)" 2050.49,859.19 r270 bottom locked
U13 "STM32F446RCT6" "64-LQFP (10x10)" 1590,533 r90 bottom locked
U18 "ESP32-S3-WROOM-1-N16R8" "41-SMD Module" 1974.46,2352.39 r0 top locked
U19 "ADS1015IDGSR" VSSOP-10 2905.61,-757.63 r180 bottom locked
U20 "TPS2375DR" SOIC-8 1291.19,578.7 r90 top locked
U21 "SP0504BAHTG" SOT-23-5 1025,1353 r180 top locked value=30pF
U22 "TX4138" 8-SOIC-EP 1939.08,598.44 r90 top locked
U23 "W5500" "48-LQFP (7x7)_" 1612,1463 r0 bottom locked
X1 "32.768kHz" SMD3215-2P 1926,200 r270 bottom locked
X2 "8MHz" SMD5032-2P 1634.8,15 r180 bottom locked
X3 "25MHz" Q22FA12800090 1980.91,1361.96 r0 bottom locked

## Footprints (in the part's own frame and the unit in brackets; to place one, negate y for a bottom-side part, rotate by r counter-clockwise, add the part's x,y. Pads: shape width x height; smd on the part's side, far side on the other; paste and mask are expansions set on the pad)
"6-DFN (1.2x1.3)" [mm]
  rect 0.53x0.28 smd mask+0.055: 1(-0.335,0.4) 2(-0.335,0) 3(-0.335,-0.4) 4(0.335,-0.4) 5(0.335,0) 6(0.335,0.4)
  silkscreen extent -0.91,-0.64 0.69,0.64, body extent -0.65,-0.6 0.65,0.6, height 0.55
8-SOIC-EP [mm]
  rect 1.55x0.6 smd: 1(-2.7,1.905) 2(-2.7,0.635) 3(-2.7,-0.635) 4(-2.7,-1.905) 5(2.7,-1.905) 6(2.7,-0.635) 7(2.7,0.635) 8(2.7,1.905)
  rect 2.613x3.502 smd: 9(0,0)
  silkscreen extent -3.76,-2.49 1.99,2.49, body extent -3,-2.45 3,2.45, height 1.7
"41-SMD Module" [mm]
  rect 1.5x0.9 smd: 1(-8.75,8.88) 2(-8.75,7.61) 3(-8.75,6.34) 4(-8.75,5.07) 5(-8.75,3.8) 6(-8.75,2.53) 7(-8.75,1.26) 8(-8.75,-0.01) 9(-8.75,-1.28) 10(-8.75,-2.55) 11(-8.75,-3.82) 12(-8.75,-5.09) 13(-8.75,-6.36) 14(-8.75,-7.63) 27(8.75,-7.63) 28(8.75,-6.36) 29(8.75,-5.09) 30(8.75,-3.82) 31(8.75,-2.55) 32(8.75,-1.28) 33(8.75,-0.01) 34(8.75,1.26) 35(8.75,2.53) 36(8.75,3.8) 37(8.75,5.07) 38(8.75,6.34) 39(8.75,7.61) 40(8.75,8.88)
  rect 0.9x1.5 smd: 15(-6.98,-8.88) 16(-5.71,-8.88) 17(-4.44,-8.88) 18(-3.17,-8.88) 19(-1.9,-8.88) 20(-0.63,-8.88) 21(0.64,-8.88) 22(1.91,-8.88) 23(3.18,-8.88) 24(4.45,-8.88) 25(5.72,-8.88) 26(6.99,-8.88)
  rect 3.7x3.7 smd: 41(-1.5,1.26)
  Keep-Out Layer region: -9.042,10.287 9.042,10.287 9.042,16.383 -9.042,16.383
  silkscreen extent -9.8,-9.2 9.09,16.43, body extent -9.01,-9.14 9.01,16.37, height 3.16
"48-LQFP (7x7)_" [mm]
  rect 1.22x0.32 smd: 1(-4.25,2.75) 2(-4.25,2.25) 3(-4.25,1.75) 4(-4.25,1.25) 5(-4.25,0.75) 6(-4.25,0.25) 7(-4.25,-0.25) 8(-4.25,-0.75) 9(-4.25,-1.25) 10(-4.25,-1.75) 11(-4.25,-2.25) 12(-4.25,-2.75) 25(4.25,-2.75) 26(4.25,-2.25) 27(4.25,-1.75) 28(4.25,-1.25) 29(4.25,-0.75) 30(4.25,-0.25) 31(4.25,0.25) 32(4.25,0.75) 33(4.25,1.25) 34(4.25,1.75) 35(4.25,2.25) 36(4.25,2.75)
  rect 0.32x1.22 smd: 13(-2.75,-4.25) 14(-2.25,-4.25) 15(-1.75,-4.25) 16(-1.25,-4.25) 17(-0.75,-4.25) 18(-0.25,-4.25) 19(0.25,-4.25) 20(0.75,-4.25) 21(1.25,-4.25) 22(1.75,-4.25) 23(2.25,-4.25) 24(2.75,-4.25) 37(2.75,4.25) 38(2.25,4.25) 39(1.75,4.25) 40(1.25,4.25) 41(0.75,4.25) 42(0.25,4.25) 43(-0.25,4.25) 44(-0.75,4.25) 45(-1.25,4.25) 46(-1.75,4.25) 47(-2.25,4.25) 48(-2.75,4.25)
  silkscreen extent -5.16,-3.58 3.66,3.58, body extent -4.51,-4.51 4.49,4.49, height 1.43
"64-LQFP (10x10)" [mm]
  rect 1.2x0.3 smd: 1(-5.75,3.75) 2(-5.75,3.25) 3(-5.75,2.75) 4(-5.75,2.25) 5(-5.75,1.75) 6(-5.75,1.25) 7(-5.75,0.75) 8(-5.75,0.25) 9(-5.75,-0.25) 10(-5.75,-0.75) 11(-5.75,-1.25) 12(-5.75,-1.75) 13(-5.75,-2.25) 14(-5.75,-2.75) 15(-5.75,-3.25) 16(-5.75,-3.75) 33(5.75,-3.75) 34(5.75,-3.25) 35(5.75,-2.75) 36(5.75,-2.25) 37(5.75,-1.75) 38(5.75,-1.25) 39(5.75,-0.75) 40(5.75,-0.25) 41(5.75,0.25) 42(5.75,0.75) 43(5.75,1.25) 44(5.75,1.75) 45(5.75,2.25) 46(5.75,2.75) 47(5.75,3.25) 48(5.75,3.75)
  rect 0.3x1.2 smd: 17(-3.75,-5.75) 18(-3.25,-5.75) 19(-2.75,-5.75) 20(-2.25,-5.75) 21(-1.75,-5.75) 22(-1.25,-5.75) 23(-0.75,-5.75) 24(-0.25,-5.75) 25(0.25,-5.75) 26(0.75,-5.75) 27(1.25,-5.75) 28(1.75,-5.75) 29(2.25,-5.75) 30(2.75,-5.75) 31(3.25,-5.75) 32(3.75,-5.75) 49(3.75,5.75) 50(3.25,5.75) 51(2.75,5.75) 52(2.25,5.75) 53(1.75,5.75) 54(1.25,5.75) 55(0.75,5.75) 56(0.25,5.75) 57(-0.25,5.75) 58(-0.75,5.75) 59(-1.25,5.75) 60(-1.75,5.75) 61(-2.25,5.75) 62(-2.75,5.75) 63(-3.25,5.75) 64(-3.75,5.75)
  silkscreen extent -6.63,-5.36 5.28,5.36, body extent -6,-6 6,6, height 1.6
53261-0771 [mm]
  rect 0.8x1.6 smd: 1(-3.75,1.45) 2(-2.5,1.45) 3(-1.25,1.45) 4(0,1.45) 5(1.25,1.45) 6(2.5,1.45) 7(3.75,1.45)
  rect 2.1x3 smd: 8(-6.3,-1.45) 9(6.3,-1.45)
  silkscreen extent -6.87,-3.65 6.88,2.16, body extent -6.95,-3.57 6.95,1.63, height 3.6
53261-0871 [mm]
  rect 0.8x1.6 smd mask+0.076: 1(-4.375,1.45) 2(-3.125,1.45) 3(-1.875,1.45) 4(-0.625,1.45) 5(0.625,1.45) 6(1.875,1.45) 7(3.125,1.45) 8(4.375,1.45)
  rect 2.1x3 smd mask+0.076: S1(-6.925,-1.45) S2(6.925,-1.45)
  silkscreen extent -7.57,-3.55 7.57,2.44, body extent -7.55,-3.51 7.6,1.69, height 3.4
AFC01-S20FCC-00 [mm]
  rect 0.3x1.3 smd: 1(-4.75,1.34) 2(-4.25,1.34) 3(-3.75,1.34) 4(-3.25,1.34) 5(-2.75,1.34) 6(-2.25,1.34) 7(-1.75,1.34) 8(-1.25,1.34) 9(-0.75,1.34) 10(-0.25,1.34) 11(0.25,1.34) 12(0.75,1.34) 13(1.25,1.34) 14(1.75,1.34) 15(2.25,1.34) 16(2.75,1.34) 17(3.25,1.34) 18(3.75,1.34) 19(4.25,1.34) 20(4.75,1.34)
  rect 2x1.6 smd: MP1(-6.45,-1.34) MP2(6.45,-1.34)
  silkscreen extent -7.12,-3.63 7.12,1.91, body extent -7.15,-4.1 7.15,1.75, height 2.11
BME680 [mm]
  rect 0.6x0.6 smd: 1(1.2,1.2) 2(1.2,0.4) 3(1.2,-0.4) 4(1.2,-1.2) 5(-1.2,-1.2) 6(-1.2,-0.4) 7(-1.2,0.4) 8(-1.2,1.2)
  silkscreen extent -0.64,-1.55 1.85,1.55, body extent -1.5,-1.5 1.5,1.5, height 1
CAP-0201 [mm]
  rect 0.3x0.3 smd mask+0.055: 1(-0.3,0) 2(0.3,0)
  silkscreen extent -0.53,-0.23 0.53,0.23, body extent -0.3,-0.15 0.3,0.15, height 0.28
Cap-0402 [mil]
  rect 18x25 smd mask+2.36: 1(-18.5,0) 2(18.5,0)
  silkscreen extent -31,-16 31,16, body extent -20,-10 20,10, height 19
Cap-0603 [mil]
  rect 30x35 smd mask+2.36: 1(-30,0) 2(30,0)
  silkscreen extent -49,-21 49,21, body extent -32,-16 31,16, height 34
Cap-0805 [mil] "SMD 0805"
  rect 40x60 smd mask+2.76: 1(-40,0) 2(40,0)
  silkscreen extent -64,-34 64,34, body extent -39,-25 39,25, height 30
Cap-1206 [mil] "SMD 1206"
  rect 60x70 smd: 1(-50,0) 2(50,0)
  silkscreen extent -84,-39 84,39, body extent -63,-31 63,32, height 39
Case-A [mm]
  rect 1.42x1.13 smd: 1(-1.2,0) 2(1.2,0)
  silkscreen extent -2.72,-0.97 1.63,0.97, body extent -1.6,-0.9 1.6,0.9, height 1.8
CASE-B [mm]
  rect 1.7x3 smd paste+0: 1(-1.7,0) 2(1.7,0)
  silkscreen extent -3.35,-1.63 2.03,1.63, body extent -1.85,-1.5 1.85,1.5, height 2.16
Case-E [mm]
  rect 2.79x2.57 smd: 1(0,0) 2(6.44,0)
  silkscreen extent -1.56,-2.31 7.03,2.31, body extent -0.27,-2.21 6.92,2.21, height 2.88
CYH127-33UH [mm]
  rect 4x6 smd mask+0.055: 1(-5.25,0) 2(5.25,0)
  silkscreen extent -6.05,-6.05 6.05,6.05, body extent -6,-6 6,6, height 7.98
ENS160-BGLT [mm]
  rect 0.85x0.85 smd paste+0 mask+0.055: 1(-1.05,1.05) 2(-1.05,0) 3(-1.05,-1.05) 4(0,-1.05) 5(1.05,-1.05) 6(1.05,0) 7(1.05,1.05) 8(0,1.05) 9(0,0)
  silkscreen extent -1.85,-1.57 1.57,1.57, body extent -1.5,-1.5 1.5,1.5, height 0.9
ESOP-8 [mm]
  rect 1.2x0.6 smd: 1(-2.909,1.905) 2(-2.909,0.635) 3(-2.909,-0.635) 4(-2.909,-1.905) 5(2.909,-1.905) 6(2.909,-0.635) 7(2.909,0.635) 8(2.909,1.905)
  rect 2.4x3.3 smd: 9(0,0)
  silkscreen extent -3.88,-2.51 1.85,2.51, body extent -3,-2.45 3,2.45, height 1.75
Fuse-0805 [mm]
  rect 1x1.7 smd: 1(-1.1,0) 2(1.1,0)
  silkscreen extent -0.41,-0.81 0.41,0.81, body extent -1.1,-0.75 1.1,0.75, height 1.24
HDR1X3_ [mm] "Connector; Header; 3 Position"
  rect 1.5x1.5 hole 0.9: 1(0,0)
  round 1.5 hole 0.9: 2(2.54,0) 3(5.08,0)
  silkscreen extent -1.27,-1.27 6.35,1.27, body extent -1.27,-1.24 6.35,1.25, height 8.54
"HDR1X4 Female" [mm]
  rect 1.6x1.6 hole 0.95: 1(-3.81,0)
  round 1.6 hole 0.95: 2(-1.27,0) 3(1.27,0) 4(3.81,0)
  silkscreen extent -5.49,-1.27 5.36,1.27, body extent -5.38,-1.3 5.28,1.24, height 8.5
HR861153C [mm]
  round 1.8 hole 0.91: 1(5.715,-6.485) 2(4.445,-3.945) 3(3.175,-6.485) 4(1.905,-3.945) 5(0.635,-6.485) 6(-0.635,-3.945) 7(-1.905,-6.485) 9(-4.445,-6.485) 10(-5.715,-3.945)
  round 2 hole 1.02: 11(6.625,6.485) 12(4.085,6.485) 13(-4.085,6.485) 14(-6.625,6.485)
  round 0 hole 3.25 unplated: MH(-5.715,2.405) MH(5.715,2.405)
  round 3 hole 1.63: "Shield 1"(-7.745,-0.645) "Shield 2"(7.745,-0.645)
  silkscreen extent -9.07,-8.46 9.02,13.23, body extent -9.01,-8.41 8.97,13.18, height 14.87
IND-0402 [mm]
  rect 0.4x0.6 smd: 1(-0.35,0) 2(0.35,0)
  silkscreen extent -0.71,-0.46 0.71,0.46, body extent -0.5,-0.25 0.5,0.25, height 0.25
"IND-0603 (1608 Metric)" [mm] "0.063\" L x 0.032\" W (1.60mm x 0.80mm)"
  rect 0.6x0.8 smd: 1(-0.7,0) 2(0.7,0)
  silkscreen extent -0.2,-0.46 0.23,0.46, body extent -0.8,-0.4 0.8,0.4, height 0.78
Ind-0805 [mm] "Inductor 0805"
  rect 1.2x1.32 smd: 1(-1,0) 2(1,0)
  silkscreen extent -0.25,-0.69 0.25,0.69, body extent -1,-0.62 1,0.63, height 0.47
"IND-1008 (2520 Metric)" [mm]
  rect 0.65x2.2 smd: 1(-0.95,0) 2(0.95,0)
  silkscreen extent -0.41,-1.04 0.41,1.04, body extent -1.25,-1 1.25,1, height 1.2
LED-0402 [mm]
  rect 0.62x0.72 smd: 1(-0.475,0) 2(0.475,0)
  silkscreen extent -0.89,-0.51 1.55,0.51, body extent -0.5,-0.25 0.51,0.25, height 0.45
LED-0603 [mm]
  rect 0.5x1 smd: 1(-0.75,0) 2(0.75,0)
  silkscreen extent -1.12,-0.66 1.75,0.66, body extent -0.82,-0.37 0.82,0.36, height 0.68
MICS-6814 [mm]
  rect 1.45x0.55 smd: A(0,0) B(0,-1.27) C(0,-2.54) F(4.4,-2.54) G(4.4,-1.27) H(4.4,0)
  rect 0.55x1.45 smd: D(0.93,-4.47) E(3.47,-4.47) J(3.47,1.93) K(0.93,1.93)
  silkscreen extent -1.09,-4.84 4.78,2.3, body extent -0.3,-4.77 4.7,2.23, height 1.92
MK-11C04-G013 [mm]
  rect 0.6x0.83 smd: 1(-1,0.678) 2(1,0.678) C(0,0.678)
  rect 0.92x0.72 smd: 4(3,-0.677) 5(-3,-0.677)
  round 0 hole 0.81 unplated: MH(-1.5,-0.602) MH(1.5,-0.602)
  silkscreen extent -2.79,-1.94 2.79,0.85, body extent -3.25,-3.06 3.25,0.64, height 0.7
"Pogo 4 Pin" [mm]
  round 1.6 smd: 1(-3.75,0) 2(-1.25,0) 3(1.25,0) 4(3.75,0)
  silkscreen extent -5.11,-1.09 4.83,1.09
Q22FA12800090 [mm]
  rect 0.95x0.85 smd: 1(0,-1.15) 2(1.45,-1.15) 3(1.45,0) 4(0,0)
  silkscreen extent -0.7,-1.41 0.78,0.29, body extent -0.3,-1.36 1.7,0.24, height 0.65
Res-0402 [mil]
  rect 18x25 smd mask+2.17: 1(-18.5,0) 2(18.5,0)
  silkscreen extent -32,-17 32,16, body extent -23,-11 23,11, height 16
Res-0603 [mil]
  rect 30x35 smd: 1(-30,0) 2(30,0)
  silkscreen extent -48,-21 48,21, body extent -31,-17 31,17, height 18
RES-0805 [mil] "SMD 0805"
  rect 40x50 smd: 1(-40,0) 2(40,0)
  silkscreen extent -64,-29 64,29, body extent -39,-25 39,24, height 24
S5B-ZR-SM4A-TF(LF)(SN) [mm]
  rect 0.7x2.7 smd: 1(3,1.825) 2(1.5,1.825) 3(0,1.825) 4(-1.5,1.825) 5(-3,1.825)
  rect 1.1x1.9 smd: 6(-4.95,-1.825) 7(4.95,-1.825)
  silkscreen extent -5.31,-3.84 5.31,2.29, body extent -5.25,-3.78 5.25,2.72, height 3.7
SMA [mm]
  rect 2.5x1.7 smd: 1(-2,0) 2(2,0)
  silkscreen extent -4.45,-1.42 2.06,1.42, body extent -2.6,-1.3 2.6,1.3, height 2.4
SMB_ [mm]
  rect 2.8x2.4 smd: 1(-2.3,0) 2(2.3,0)
  silkscreen extent -2.21,-1.9 4.83,1.91, body extent -2.7,-1.8 2.7,1.8, height 2.3
SMD3215-2P [mm]
  rect 1x1.8 smd: 1(-1.25,0) 2(1.25,0)
  silkscreen extent -0.56,-0.81 0.56,0.81, body extent -1.6,-0.75 1.6,0.75, height 0.8
SMD5032-2P [mm]
  rect 1.7x2.4 smd: 1(-1.85,0) 2(1.85,0)
  silkscreen extent -2.51,-1.65 2.51,1.65, body extent -2.5,-1.6 2.5,1.6, height 1.3
SMRH74-220MT [mm]
  rect 2x2.5 smd: 1(-3.2,0) 2(3.2,0)
  silkscreen extent -3.75,-3.75 3.75,3.75, body extent -3.74,-3.76 3.76,3.74, height 4.52
SOD-123FL [mm]
  rect 1.34x1.8 smd: 1(-1.43,0) 2(1.43,0)
  silkscreen extent -3.25,-1.17 2.26,1.17, body extent -1.8,-0.82 1.8,0.82, height 0.95
SOIC-8 [mm]
  rect 1.55x0.6 smd: 1(-2.7,1.905) 2(-2.7,0.635) 3(-2.7,-0.635) 4(-2.7,-1.905) 5(2.7,-1.905) 6(2.7,-0.635) 7(2.7,0.635) 8(2.7,1.905)
  silkscreen extent -3.76,-2.49 1.99,2.49, body extent -3,-2.45 3,2.45, height 1.7
"Solder Bridge" [mil] "Solder Bridge ON"
  rect 30x35 smd: 1(-30,0) 2(30,0)
  silkscreen extent -50,-22 50,22
"Solder Bridge 0402" [mil]
  rect 18x25 smd mask+2.17: 1(-18.5,0) 2(18.5,0)
  silkscreen extent -32,-17 32,16
Sot-23 [mm] "TRANS NPN 40V 0.6A SOT23"
  rect 0.82x0.92 smd: 1(-0.95,-1) 2(0.95,-1) 3(0,1)
  silkscreen extent -1.68,-1.3 1.55,0.81, body extent -1.5,-1.25 1.5,1.25, height 1.05
SOT-23 [mm] "TRANS NPN 40V 0.6A SOT23"
  rect 0.82x0.92 smd: 1(-0.95,-1) 2(0.95,-1) 3(0,1)
  silkscreen extent -1.68,-1.3 1.55,0.81, body extent -1.5,-1.25 1.5,1.25, height 1.05
SOT-23-5 [mm]
  rect 1.1x0.6 smd: 1(-1.3,0.95) 2(-1.3,0) 3(-1.3,-0.95) 4(1.3,-0.95) 5(1.3,0.95)
  silkscreen extent -2.13,-1.5 0.88,1.5, body extent -1.4,-1.45 1.4,1.45, height 1.45
SOT-23-6 [mm]
  rect 1.22x0.62 smd: 1(-1.31,0.95) 2(-1.31,0) 3(-1.31,-0.95) 4(1.31,-0.95) 5(1.31,0) 6(1.31,0.95)
  silkscreen extent -2.18,-1.52 0.86,1.52, body extent -1.5,-1.5 1.5,1.5, height 1.47
SOT-25-5 [mm]
  rect 1x0.7 smd: 1(-1.2,0.95) 2(-1.2,0) 3(-1.2,-0.95) 4(1.2,-0.95) 5(1.2,0.95)
  silkscreen extent -1.98,-1.55 0.76,1.55, body extent -1.19,-1.5 1.21,1.5, height 1.1
SOT-89-3 [mm]
  rect 0.58x1.73 smd: 1(-1.5,-1.132) 2(0,-1.132) 3(1.5,-1.132)
  rect 1.933x3.03 smd: 2(0,1.132)
  silkscreen extent -2.31,-1.27 2.31,1.73, body extent -2.25,-1.84 2.25,2.41, height 1.54
SOT-143-4_ [mm]
  rect 1.4x1.1 smd: 1(0,0)
  rect 1.4x0.8 smd: 2(0,-1.7) 3(2.2,-1.7) 4(2.2,0.2)
  silkscreen extent -0.99,-2.27 1.76,0.77, body extent -0.08,-2.21 2.29,0.71, height 1.22
SOT-583 [mm]
  rect 0.67x0.3 smd: 1(-0.74,0.75) 2(-0.74,0.25) 3(-0.74,-0.25) 4(-0.74,-0.75) 5(0.74,-0.75) 6(0.74,-0.25) 7(0.74,0.25) 8(0.74,0.75)
  silkscreen extent -1.35,-1.07 0.56,1.07, body extent -0.8,-1.05 0.8,1.05, height 0.6
SOT-723 [mm]
  rect 0.5x0.45 smd: 1(-0.4,-0.575) 2(0.4,-0.575) 3(0,0.575)
  silkscreen extent -0.94,-0.66 0.64,0.64, body extent -0.6,-0.6 0.6,0.6, height 0.5
Test-point [mil]
  oct 60x60 smd: 1(0,0)
  silkscreen extent -37,-37 37,37
TP12422673 [mm]
  rect 0.9x1.8 smd: 1(-2.45,-1.2) 2(2.45,-1.2) MP(-3.65,1.2) MP(3.65,1.2)
  round 0 hole 1.1 unplated: MH(-1,-0.7) MH(1,-0.7)
  silkscreen extent -3.43,-1.73 3.53,2.26, body extent -3.98,-1.68 3.98,5.74, height 3.52
TS-1185EC-C-D-B_ [mm]
  rect 1.25x0.9 smd: 1(-1.925,0.75) 1(1.925,0.75) 2(-1.925,-0.75) 2(1.925,-0.75)
  silkscreen extent -2.84,-1.52 1.78,1.52, body extent -2.33,-1.5 2.32,1.5, height 2
TSSOP-20 [mm]
  rect 1.26x0.36 smd: 1(-2.9,2.925) 2(-2.9,2.275) 3(-2.9,1.625) 4(-2.9,0.975) 5(-2.9,0.325) 6(-2.9,-0.325) 7(-2.9,-0.975) 8(-2.9,-1.625) 9(-2.9,-2.275) 10(-2.9,-2.925) 11(2.9,-2.925) 12(2.9,-2.275) 13(2.9,-1.625) 14(2.9,-0.975) 15(2.9,-0.325) 16(2.9,0.325) 17(2.9,0.975) 18(2.9,1.625) 19(2.9,2.275) 20(2.9,2.925)
  silkscreen extent -3.82,-3.35 1.93,3.35, body extent -3.3,-3.3 3.3,3.3, height 1.09
TYPE-C-31-M-12_ [mm]
  rect 0.6x1.2 smd: A1/B12(0,0) A4/B9(0.8,0) B1/A12(6.4,0) B4/A9(5.6,0)
  rect 0.3x1.2 smd: A5(1.95,0) A6(2.95,0) A7(3.45,0) A8(4.45,0) B5(4.95,0) B6(3.95,0) B7(2.45,0) B8(1.45,0)
  round 0 hole 0.62 unplated: MH(0.31,-1.07) MH(6.09,-1.07)
  oval 0.9x2 hole 0.6 slot 1.7 at 90 deg: S1(7.525,-0.57) S4(-1.125,-0.57)
  oval 0.9x1.7 hole 0.6 slot 1.4 at 90 deg: S2(7.525,-4.75) S3(-1.125,-4.75)
  silkscreen extent -1.3,-5.94 7.7,-1.93, body extent -1.27,-7.32 7.67,0.58, height 3.31
VMMC0571J150MV [mm]
  rect 3.3x1 smd: 1(-2.2,0) 2(2.2,0)
  silkscreen extent -3.86,-3.35 3.33,3.35, body extent -3.5,-3.3 3.5,3.3, height 5.7
"Voltlink Target" [mm]
  rect 0.5x1.6 smd: 1(-2.5,-1.262) 2(-1.5,-1.262) 3(-0.5,-1.262) 4(0.5,-1.262) 5(1.5,-1.262) 6(2.5,-1.262)
  rect 1.2x1.8 smd: MP1(-3.8,1.262) MP2(3.8,1.262)
  silkscreen extent -4.06,-1.68 4.06,2.17, body extent -4,-1.49 4,2.11, height 4.25
VSSOP-10 [mm]
  rect 1.45x0.3 smd: 1(-2.2,1) 2(-2.2,0.5) 3(-2.2,0) 4(-2.2,-0.5) 5(-2.2,-1) 6(2.2,-1) 7(2.2,-0.5) 8(2.2,0) 9(2.2,0.5) 10(2.2,1)
  silkscreen extent -3.17,-1.55 1.52,1.55, body extent -2.56,-1.5 2.51,1.5, height 1.09
WAFER-PH2.0-2PWB [mm]
  rect 1x3.5 smd: 1(-1,2.85) 2(1,2.85)
  rect 1.5x3.5 smd: MP1(-3.35,-2.85) MP2(3.35,-2.85)
  silkscreen extent -4.09,-4.85 4.04,3.56, body extent -4.03,-4.8 3.97,3.7, height 5.59
YC164-FR-0710KL [mm]
  rect 0.9x0.65 smd: 1(0,0) 4(0,-2.48) 5(1.77,-2.48) 8(1.77,0)
  rect 0.9x0.53 smd: 2(0,-0.84) 3(0,-1.64) 6(1.77,-1.64) 7(1.77,-0.84)
  silkscreen extent -0.79,-2.96 1.77,0.48, body extent 0.08,-2.84 1.69,0.36, height 0.7

## Part data
C1 C4 C6 C10 C14 C18 C20 C25 C26 C30 C31 C36: library part CC0402MRX5R6BB106, "CAP CER 10UF 10V X5R 0402", Case Code (Imperial)=0402, Case Code (Metric)=1005, LCSC Part Number=C962143, Manufacturer=Yageo, Max Operating Temperature=85°C, Min Operating Temperature=-55°C, Supplier Part Number 1=6097631, Tolerance=20%, Voltage Rating=10V, Capacitance=10uF, Case/Package=0402, Category="Ceramic Capacitors", ComponentLink1Description=http://www.yageo.com/documents/recent/UPY-GPHC_X5R_4V-to-50V_25.pdf?src-supplier=Digi-Key, ComponentLink1URL=http://www.yageo.com/documents/recent/UPY-GPHC_X5R_4V-to-50V_25.pdf?src-supplier=Digi-Key, Item Type=Capacitor, Manufacturer Part Number=CC0402MRX5R6BB106, Mount="Surface Mount", Packaging="Tape and Reel", Pricing 1="10000=0.02650, 20000=0.02590, 30000=0.02550, 40000=0.02530, 50000=0.02450 (USD)", RoHS=Yes, RoHS Compliant=Yes, Stock 1=80000, Supplier 1="Future Electronics"
C2: library part CC1206KKX7RCBB472, "CAP CER 4700PF 1KV X7R 1206", Case Code (Imperial)=1206, Case Code (Metric)=3216, Dielectric=X7R, Dielectric Material=Ceramic, LCSC Part Number=C107198, Manufacturer=Yageo, Max Operating Temperature=125°C, Min Operating Temperature=-55°C, Supplier Part Number 1=7130131, Tolerance=10%, Voltage Rating=1kV, Capacitance=4.7nF, Case/Package=1206, Category="Ceramic Capacitors", ComponentLink1Description=https://datasheet.ciiva.com/13208/upy-gp-np0-16v-to-50v-8-13208693.pdf?src-supplier=Mouser, ComponentLink1URL=https://datasheet.ciiva.com/13208/upy-gp-np0-16v-to-50v-8-13208693.pdf?src-supplier=Mouser, ComponentLink2Description=https://datasheet.ciiva.com/11466/hv-11466701.pdf?src-supplier=Avnet, ComponentLink2URL=https://datasheet.ciiva.com/11466/hv-11466701.pdf?src-supplier=Avnet, Depth=1.6mm, Item Type=Capacitor, Lead Free="Lead Free", Length=3.2mm, Manufacturer Part Number=CC1206KKX7RCBB472, Mount="Surface Mount", Number of Pins=2, Packaging="Tape and Reel", Pricing 1="3000=0.02860, 9000=0.02750, 15000=0.02700, 45000=0.02600, 75000=0.02510 (USD)", Radiation Hardening=No, Resistor Type=Ceramic, RoHS=Yes, RoHS Compliant=Yes, Series=CC, Stock 1=180000, Supplier 1="Future Electronics", Termination=SMD/SMT, Thickness=0.057inch, Voltage Rating (DC)=1kV, Weight=0.000571oz, Width=0.063inch
C3 C5 C7 C8 C9 C11 C12 C13 C15 C16 C17 C24 C27 C28 C29 C34 C35 C37 C42 C45 C47 C59 C60 C73 C77 C79 C81 C82 C83: library part C1005X5R1H104K050BB, "CAP CER 0.1UF 50V X5R 0402", Capacitance=100nF, Case Code (Imperial)=0402, Case Code (Metric)=1005, Dielectric=X5R, Dielectric Material=Ceramic, LCSC Part Number=C2181865, Manufacturer=TDK, Max Operating Temperature=85°C, Min Operating Temperature=-55°C, Package Quantity=1, Supplier Part Number 1=445-5942-1-ND, Tolerance=10%, Voltage=50V, Case/Package=0402, ComponentLink1Description=https://product.tdk.com/info/en/catalog/spec/mlccspec_commercial_general_midvoltage_en.pdf?src-supplier=Digi-Key, ComponentLink1URL=https://product.tdk.com/info/en/catalog/spec/mlccspec_commercial_general_midvoltage_en.pdf?src-supplier=Digi-Key, ComponentLink2Description=http://www.tdk.co.jp/tefe02/e413_c.pdf?src-supplier=Future+Electronics, ComponentLink2URL=http://www.tdk.co.jp/tefe02/e413_c.pdf?src-supplier=Future+Electronics, ComponentLink3Description=https://www.verical.com/server-webapp/html/getDatasheet?partID=743571&src-supplier=Verical, ComponentLink3URL=https://www.verical.com/server-webapp/html/getDatasheet?partID=743571&src-supplier=Verical, ComponentLink4Description=http://www.tdk.co.jp/tefe02/e412_c.pdf?src-supplier=Avnet+Europe, ComponentLink4URL=http://www.tdk.co.jp/tefe02/e412_c.pdf?src-supplier=Avnet+Europe, Construction=Flat, Depth=0.5mm, Height=0.5mm, Lead Free="Lead Free", Length=1mm, Manufacturer Part Number=C1005X5R1H104K050BB, Mount="Surface Mount", Packaging="Tape and Reel", Pricing 1="1=0.12, 10=0.09, 50=0.049, 100=0.04, 500=0.02858, 1000=0.02245, 2500=0.02041, 5000=0.01878 (USD)", Radiation Hardening=No, REACH SVHC="No SVHC", Resistor Type=Ceramic, RoHS Compliant=Yes, Series=C, Stock 1=1455182, Supplier 1=Digi-Key, Termination=SMD/SMT, Thickness=0.022inch, Voltage Rating=50V, Voltage Rating (DC)=50V, Weight=2.3E-05oz, Width=0.02inch
C19: library part TAJB107M010RNJ, "CAP TANT 100UF 20% 10V 1411", Case Code (Imperial)=1210, Case Code (Metric)=3528, Dielectric Material=Tantalum, ESR (Equivalent Series Resistance)=1.4R, LCSC Part Number=C7196, Leakage Current=10uA, Manufacturer="Kyocera AVX", Max Operating Temperature=125°C, Min Operating Temperature=-55°C, Package Quantity=2000, Supplier Part Number 1=1354069, Tolerance=10%, Voltage=10V, Case/Package=1210, Category="Tantalum Capacitors", ComponentLink1Description=https://datasheet.ciiva.com/264/taj-264281.pdf?src-supplier=Digi-Key, ComponentLink1URL=https://datasheet.ciiva.com/264/taj-264281.pdf?src-supplier=Digi-Key, ComponentLink2Description=https://datasheet.ciiva.com/264/taj-264280.pdf?src-supplier=Digi-Key, ComponentLink2URL=https://datasheet.ciiva.com/264/taj-264280.pdf?src-supplier=Digi-Key, ComponentLink3Description=https://datasheet.ciiva.com/264/taj-264282.pdf?src-supplier=Digi-Key, ComponentLink3URL=https://datasheet.ciiva.com/264/taj-264282.pdf?src-supplier=Digi-Key, ComponentLink4Description=https://datasheet.ciiva.com/11225/taj-11225964.pdf?src-supplier=Avnet, ComponentLink4URL=https://datasheet.ciiva.com/11225/taj-11225964.pdf?src-supplier=Avnet, ComponentLink5Description=https://datasheet.ciiva.com/11225/taj-11225963.pdf?src-supplier=Avnet, ComponentLink5URL=https://datasheet.ciiva.com/11225/taj-11225963.pdf?src-supplier=Avnet, Construction=Flat, Depth=2.8mm, Dissipation Factor=8%, Features="General Purpose", Height=2.1mm, Item Type=Capacitor, Lead Free="Lead Free", Length=3.5mm, Manufacturer Part Number=TAJB107M010RNJ, Mounting Technology="Surface Mount", Packaging="Tape and Reel", Pricing 1="2000=0.302 (GBP)", Radiation Hardening=No, Reach SVHC Compliant=No, RoHS=Yes, RoHS Compliant=Yes, Series=TAJ, Stock 1=17520, Supplier 1=Rs, Termination=SMD/SMT, Voltage Rating=10V, Voltage Rating (DC)=10V, Width=2.8mm
C21 C22: library part CS2012X5R226M250NRE, "25V 22uF X5R ±20% 0805 Multilayer Ceramic Capacitors MLCC - SMD/SMT ROHS", LCSC Part Number=C513764, Manufacturer=Samwha, Package=0805, ComponentLink1Description=LCSC, ComponentLink1URL=https://www.lcsc.com/product-detail/Multilayer-Ceramic-Capacitors-MLCC-SMD-SMT_Samwha-span-style-background-color-ff0-Capacitor-span-CS2012X5R226M250NRE_C513764.html, Item Type=Capacitor, Manufacturer Part Number=CS2012X5R226M250NRE
C23: library part TAJB336K010RNJ, "CAP TANT 33UF 10% 10V 1411", Case Code (Imperial)=1210, Case Code (Metric)=3528, Dielectric Material=Tantalum, ESR (Equivalent Series Resistance)=1.8R, LCSC Part Number=C7202, Leakage Current=3.3uA, Manufacturer="Kyocera AVX", Max Operating Temperature=125°C, Min Operating Temperature=-55°C, Package Quantity=1, Supplier Part Number 1=1364604P, Tolerance=10%, Voltage=10V, Case/Package=1210, Category="Tantalum Capacitors", ComponentLink1Description=https://datasheet.ciiva.com/26341/559435-da-01-en-tacc-b-3-2-mm-x-2-5-mm-x-1-9-mm-33-uf-26341776.pdf?src-supplier=Conrad, ComponentLink1URL=https://datasheet.ciiva.com/26341/559435-da-01-en-tacc-b-3-2-mm-x-2-5-mm-x-1-9-mm-33-uf-26341776.pdf?src-supplier=Conrad, ComponentLink2Description=https://datasheet.ciiva.com/7775/49917-7775706.pdf?src-supplier=Element14, ComponentLink2URL=https://datasheet.ciiva.com/7775/49917-7775706.pdf?src-supplier=Element14, ComponentLink3Description=https://datasheet.ciiva.com/7775/49917-7775705.pdf?src-supplier=Element14, ComponentLink3URL=https://datasheet.ciiva.com/7775/49917-7775705.pdf?src-supplier=Element14, ComponentLink4Description=https://datasheet.ciiva.com/7775/1680476-7775704.pdf?src-supplier=Element14, ComponentLink4URL=https://datasheet.ciiva.com/7775/1680476-7775704.pdf?src-supplier=Element14, ComponentLink5Description=https://datasheet.ciiva.com/264/taj-264134.pdf?src-supplier=Digi-Key, ComponentLink5URL=https://datasheet.ciiva.com/264/taj-264134.pdf?src-supplier=Digi-Key, ComponentLink6Description=https://datasheet.ciiva.com/264/taj-264133.pdf?src-supplier=Digi-Key, ComponentLink6URL=https://datasheet.ciiva.com/264/taj-264133.pdf?src-supplier=Digi-Key, ComponentLink7Description=https://datasheet.ciiva.com/264/taj-264135.pdf?src-supplier=Digi-Key, ComponentLink7URL=https://datasheet.ciiva.com/264/taj-264135.pdf?src-supplier=Digi-Key, ComponentLink8Description=https://datasheet.ciiva.com/12884/taj-27497-12884279.pdf?src-supplier=Mouser, ComponentLink8URL=https://datasheet.ciiva.com/12884/taj-27497-12884279.pdf?src-supplier=Mouser, ComponentLink9Description=https://datasheet.ciiva.com/14590/70001050-14590215.pdf?src-supplier=Allied+Electronics, ComponentLink9URL=https://datasheet.ciiva.com/14590/70001050-14590215.pdf?src-supplier=Allied+Electronics, ComponentLink10Description=https://datasheet.ciiva.com/14592/70001050-14592670.pdf?src-supplier=Allied+Electronics, ComponentLink10URL=https://datasheet.ciiva.com/14592/70001050-14592670.pdf?src-supplier=Allied+Electronics, ComponentLink11Description=https://datasheet.ciiva.com/11224/taj-11224937.pdf?src-supplier=Avnet, ComponentLink11URL=https://datasheet.ciiva.com/11224/taj-11224937.pdf?src-supplier=Avnet, ComponentLink12Description=https://datasheet.ciiva.com/16492/taj-16492863.pdf?src-supplier=Future+Electronics, ComponentLink12URL=https://datasheet.ciiva.com/16492/taj-16492863.pdf?src-supplier=Future+Electronics, ComponentLink13Description=https://datasheet.ciiva.com/11224/taj-11224941.pdf?src-supplier=Avnet, ComponentLink13URL=https://datasheet.ciiva.com/11224/taj-11224941.pdf?src-supplier=Avnet, Construction=Flat, Depth=2.8mm, Dissipation Factor=6%, Features="General Purpose", Height=1.9mm, Height - Seated (Max)=0.083inch, Item Type=Capacitor, Lead Free="Lead Free", Lead Pitch=1.4mm, Length=3.5mm, Manufacturer Part Number=TAJB336K010RNJ, Mounting Technology="Surface Mount,PCB", Packaging="Tape and Reel", Pins=2, Polarity=Polar, Pricing 1="100=0.01410, 400=0.24800, 1000=0.21600 (GBP)", Radiation Hardening=No, Reach SVHC Compliant=Yes, RoHS=Yes, RoHS Compliant=Yes, Series=TAJ, Stock 1=1580, Supplier 1=Rs, Termination=SMD/SMT, Voltage Rating=10V, Voltage Rating (DC)=10V, Width=2.8mm
C38: library part CC0603JRNPO9BN150, "CAP CER 15PF 50V C0G/NPO 0603", Case Code (Imperial)=0603, Case Code (Metric)=1608, Dielectric=C0G, Dielectric Material=Ceramic, Insulation Resistance=100GR, LCSC Part Number=C107037, Manufacturer=Yageo, Max Operating Temperature=125°C, Min Operating Temperature=-55°C, Package Quantity=1, Supplier Part Number 1=4234670, Tolerance=5%, Voltage Rating=50V, Case/Package=0603, Category="Ceramic Capacitors", ComponentLink1Description=https://datasheet.ciiva.com/144/mlccorderingcode-144635.pdf?src-supplier=Digi-Key, ComponentLink1URL=https://datasheet.ciiva.com/144/mlccorderingcode-144635.pdf?src-supplier=Digi-Key, ComponentLink2Description=https://datasheet.ciiva.com/144/mlccorderingcode-144636.pdf?src-supplier=Digi-Key, ComponentLink2URL=https://datasheet.ciiva.com/144/mlccorderingcode-144636.pdf?src-supplier=Digi-Key, ComponentLink3Description=https://datasheet.ciiva.com/8033/1443161-8033721.pdf?src-supplier=Element14, ComponentLink3URL=https://datasheet.ciiva.com/8033/1443161-8033721.pdf?src-supplier=Element14, ComponentLink4Description=https://datasheet.ciiva.com/28450/1443161-28450472.pdf?src-supplier=Element14, ComponentLink4URL=https://datasheet.ciiva.com/28450/1443161-28450472.pdf?src-supplier=Element14, ComponentLink5Description=https://datasheet.ciiva.com/144/mlccorderingcode-144634.pdf?src-supplier=Digi-Key, ComponentLink5URL=https://datasheet.ciiva.com/144/mlccorderingcode-144634.pdf?src-supplier=Digi-Key, ComponentLink6Description=https://datasheet.ciiva.com/8033/1734582-8033723.pdf?src-supplier=Element14, ComponentLink6URL=https://datasheet.ciiva.com/8033/1734582-8033723.pdf?src-supplier=Element14, ComponentLink7Description=https://datasheet.ciiva.com/8033/1734582-8033722.pdf?src-supplier=Element14, ComponentLink7URL=https://datasheet.ciiva.com/8033/1734582-8033722.pdf?src-supplier=Element14, ComponentLink8Description=https://datasheet.ciiva.com/11464/upy-gp-np0-16v-to-50v-8-11464727.pdf?src-supplier=Avnet, ComponentLink8URL=https://datasheet.ciiva.com/11464/upy-gp-np0-16v-to-50v-8-11464727.pdf?src-supplier=Avnet, Depth=0.8mm, Height=0.8mm, Item Type=Capacitor, Lead Free="Lead Free", Length=1.6mm, Manufacturer Part Number=CC0603JRNPO9BN150, Mounting Technology="Surface Mount", Packaging="Tape and Reel", Pins=2, Pricing 1="4000=0.0038, 16000=0.0036, 80000=0.0034, 160000=0.0033, 500000=0.0031 (USD)", Radiation Hardening=No, Reach SVHC Compliant=No, RoHS=Yes, RoHS Compliant=Yes, Series=CC, Stock 1=832000, Supplier 1="Future Electronics", Termination=SMD/SMT, Thickness=0.035inch, Width=0.031inch
C39 C68 C76: library part CC0603JRNPO9BN103, "CAP CER 10000PF 50V C0G/NPO 0603", Case/Package=0603, LCSC Part Number=C389113, Manufacturer=Yageo, Max Operating Temperature=125°C, Min Operating Temperature=-55°C, Tolerance=5%, Voltage Rating=50V, Capacitance=10nF, Category="Ceramic Capacitors", ComponentLink1Description=http://www.yageo.com/documents/recent/UPY-GP_NP0_16V-to-50V_16.pdf?src-supplier=Digi-Key, ComponentLink1URL=http://www.yageo.com/documents/recent/UPY-GP_NP0_16V-to-50V_16.pdf?src-supplier=Digi-Key, ComponentLink2Description=http://www.yageo.com/exep/pages/download/literatures/ProductSelectionGuide%202014_Final_2.pdf?src-supplier=Digi-Key, ComponentLink2URL=http://www.yageo.com/exep/pages/download/literatures/ProductSelectionGuide%202014_Final_2.pdf?src-supplier=Digi-Key, Item Type=Capacitor, Length=0.063inch, Manufacturer Part Number=CC0603JRNPO9BN103, Mount="Surface Mount", Packaging="Tape and Reel", Pricing 1="1=0.42340, 10=0.29770, 25=0.25590, 100=0.19550, 250=0.19360, 500=0.14320, 1000=0.12060, 3000=0.11930 (USD)", RoHS=Yes, RoHS Compliant=Yes, Stock 1=5425, Supplier 1="Arrow Electronics", Supplier Part Number 1=CC0603JRNPO9BN103, Thickness=0.035inch, Width=0.031inch
C40 C46: library part CGA1A2C0G1E100D030BA, "CAP CER 10PF 25V C0G 0201", Case Code (Imperial)=0201, Case Code (Metric)=0603, Dielectric=C0G, LCSC Part Number=C2168728, Manufacturer=TDK, Max Operating Temperature=125°C, Min Operating Temperature=-55°C, Package Quantity=1, Ratings=AEC-Q200, Resistor Type=Ceramic, Supplier Part Number 1=445-9023-1-ND, Voltage Rating=25V, Capacitance=10pF, Case/Package=0201, Category="Ceramic Capacitors", ComponentLink1Description=https://datasheet.ciiva.com/24220/cga1a2c0g1e100d030ba-271838-24220873.pdf?src-supplier=Mouser, ComponentLink1URL=https://datasheet.ciiva.com/24220/cga1a2c0g1e100d030ba-271838-24220873.pdf?src-supplier=Mouser, Depth=0.3mm, Height=0.3mm, Item Type=Capacitor, Length=0.6mm, Manufacturer Part Number=CGA1A2C0G1E100D030BA, Mount="Surface Mount", Packaging="Tape and Reel", Pricing 1="1=0.11000, 10=0.07900, 50=0.04340, 100=0.03540, 500=0.02530, 1000=0.01987, 2500=0.01807, 5000=0.01662 (USD)", RoHS=Yes, RoHS Compliant=Yes, Series=CGA, Stock 1=28695, Supplier 1=Digi-Key, Termination=SMD/SMT, Thickness=0.013inch, Voltage Rating (DC)=25V, Weight=6E-06oz, Width=0.3mm